# Altium PCB Single_ETU_b_rev1.PcbDoc (part 1 of 6)
Units mil, origin at the board's own origin, x right, y up, seen from the top; angles counter-clockwise.
Board outline 5341 x 2710 mil, 10 copper layers (Top Layer, GND1, Signal 1, GND2, VDDA, VDD, GND3, Signal 2, GND4, Bottom Layer), stack 59.76 mil thick; 283 components, 478 nets, 1863 pads, 875 vias.
Unrouted connection lines stored in the file: 3.
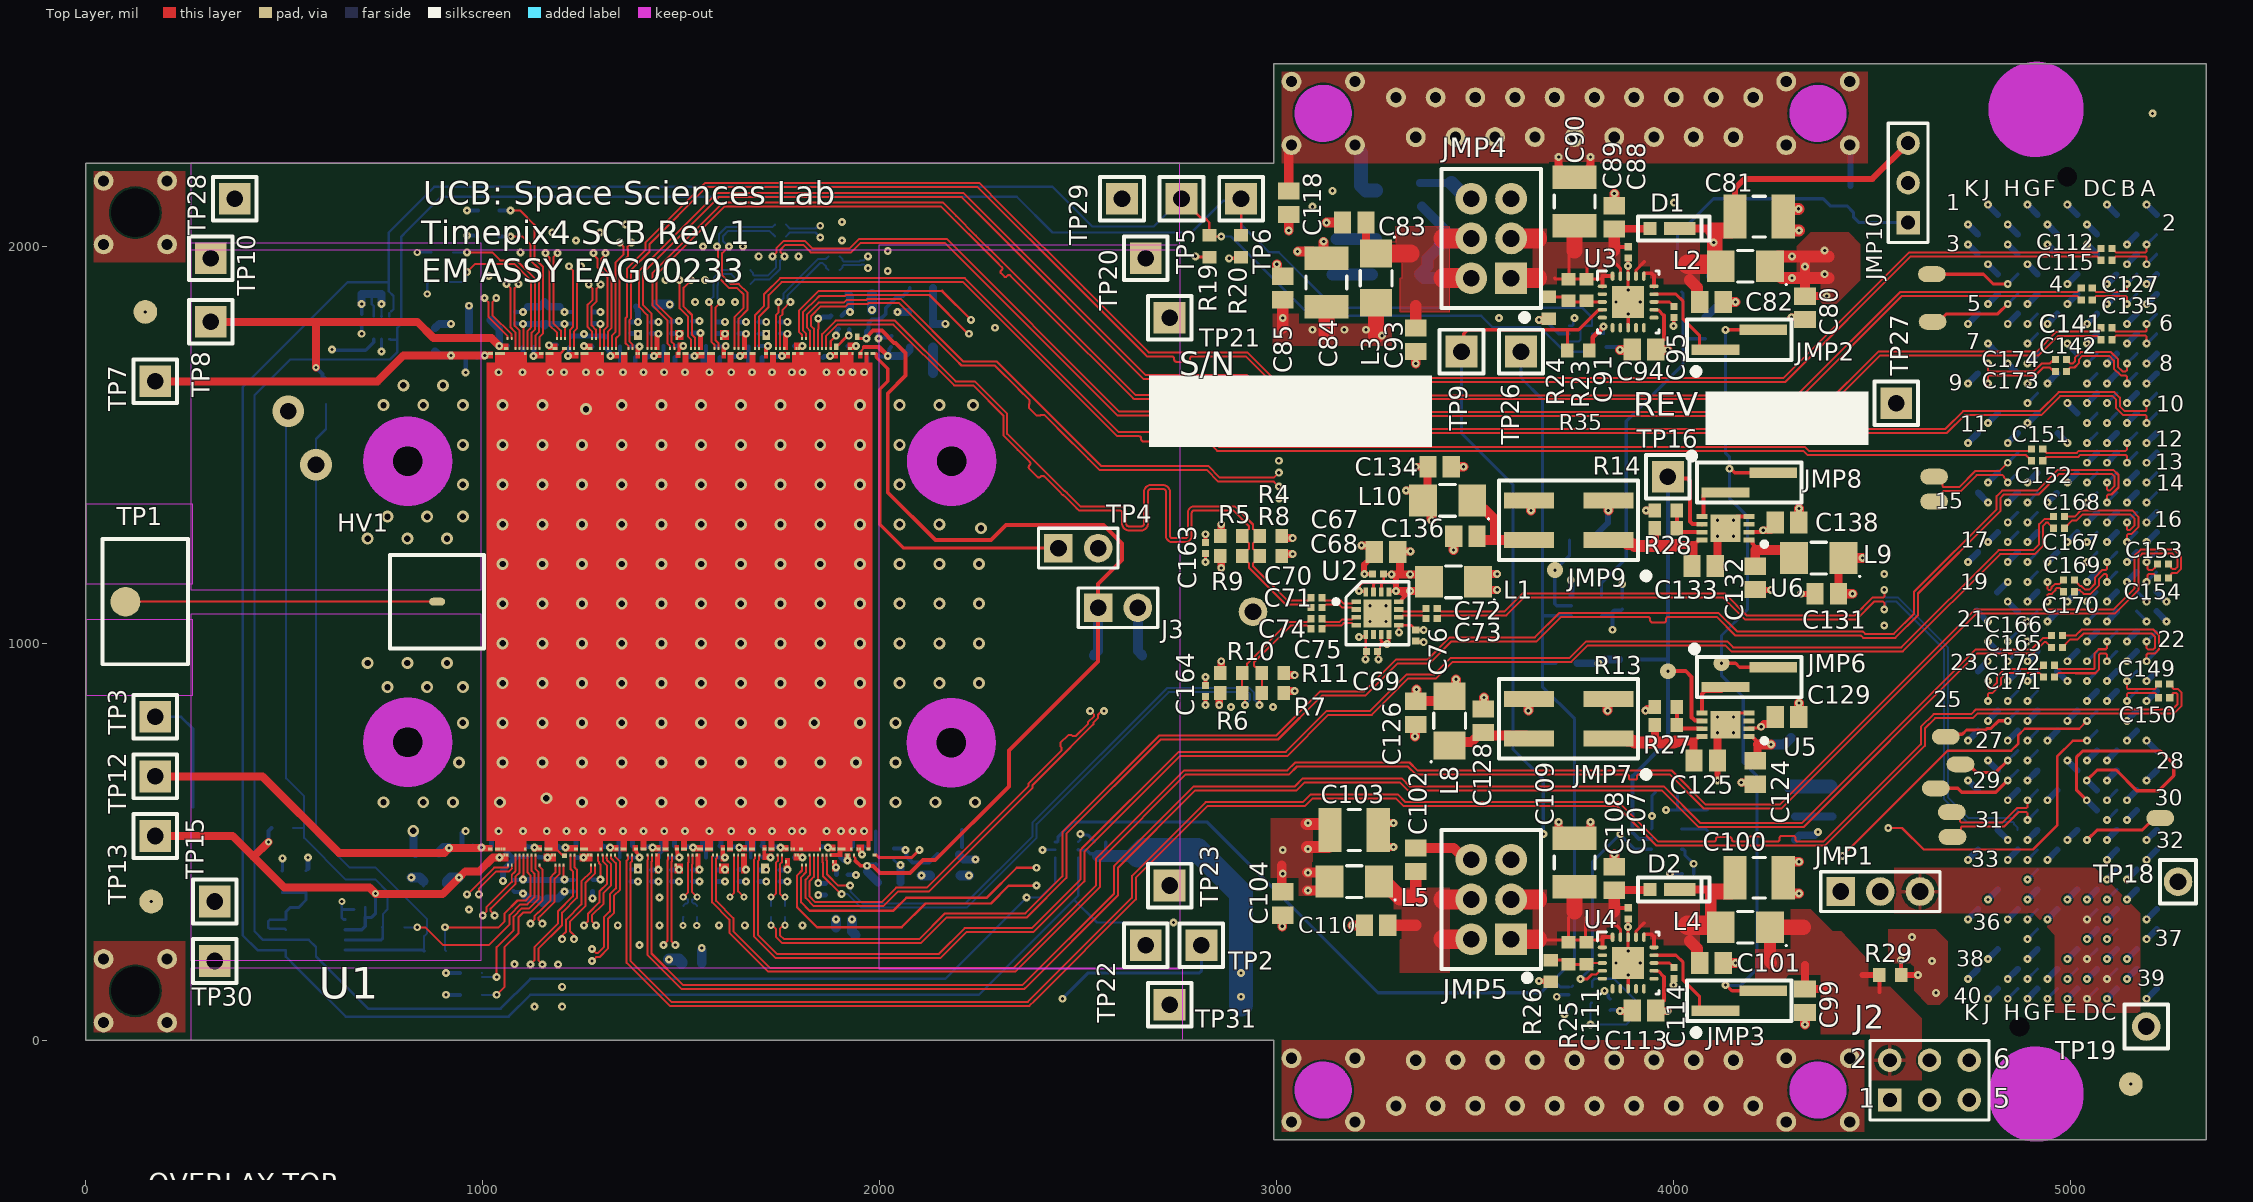
[diagram p0: Top Layer view]
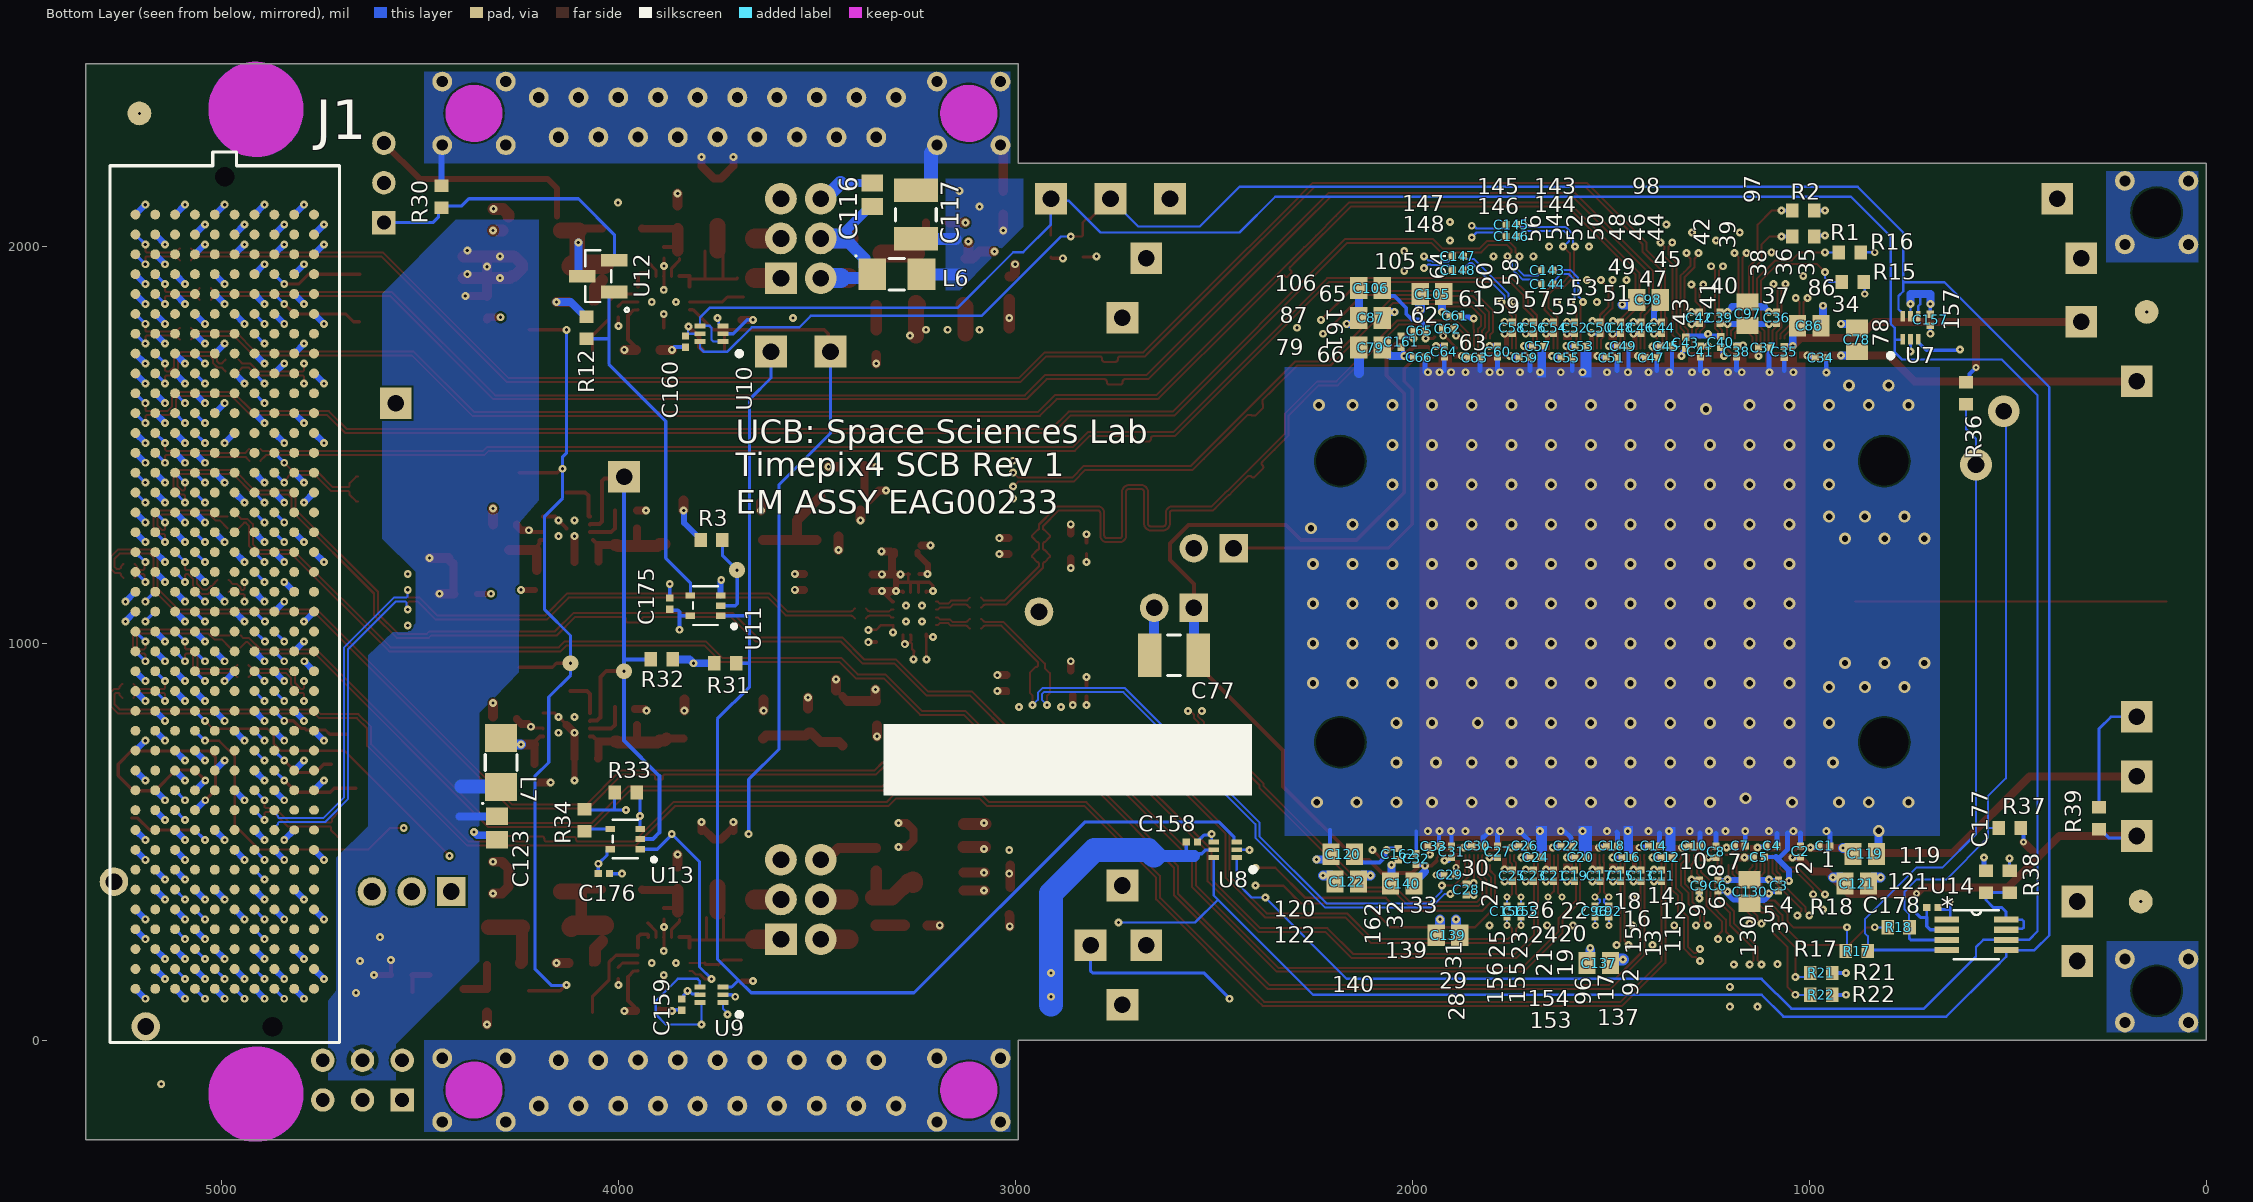
[diagram p1: Bottom Layer view, seen from below]
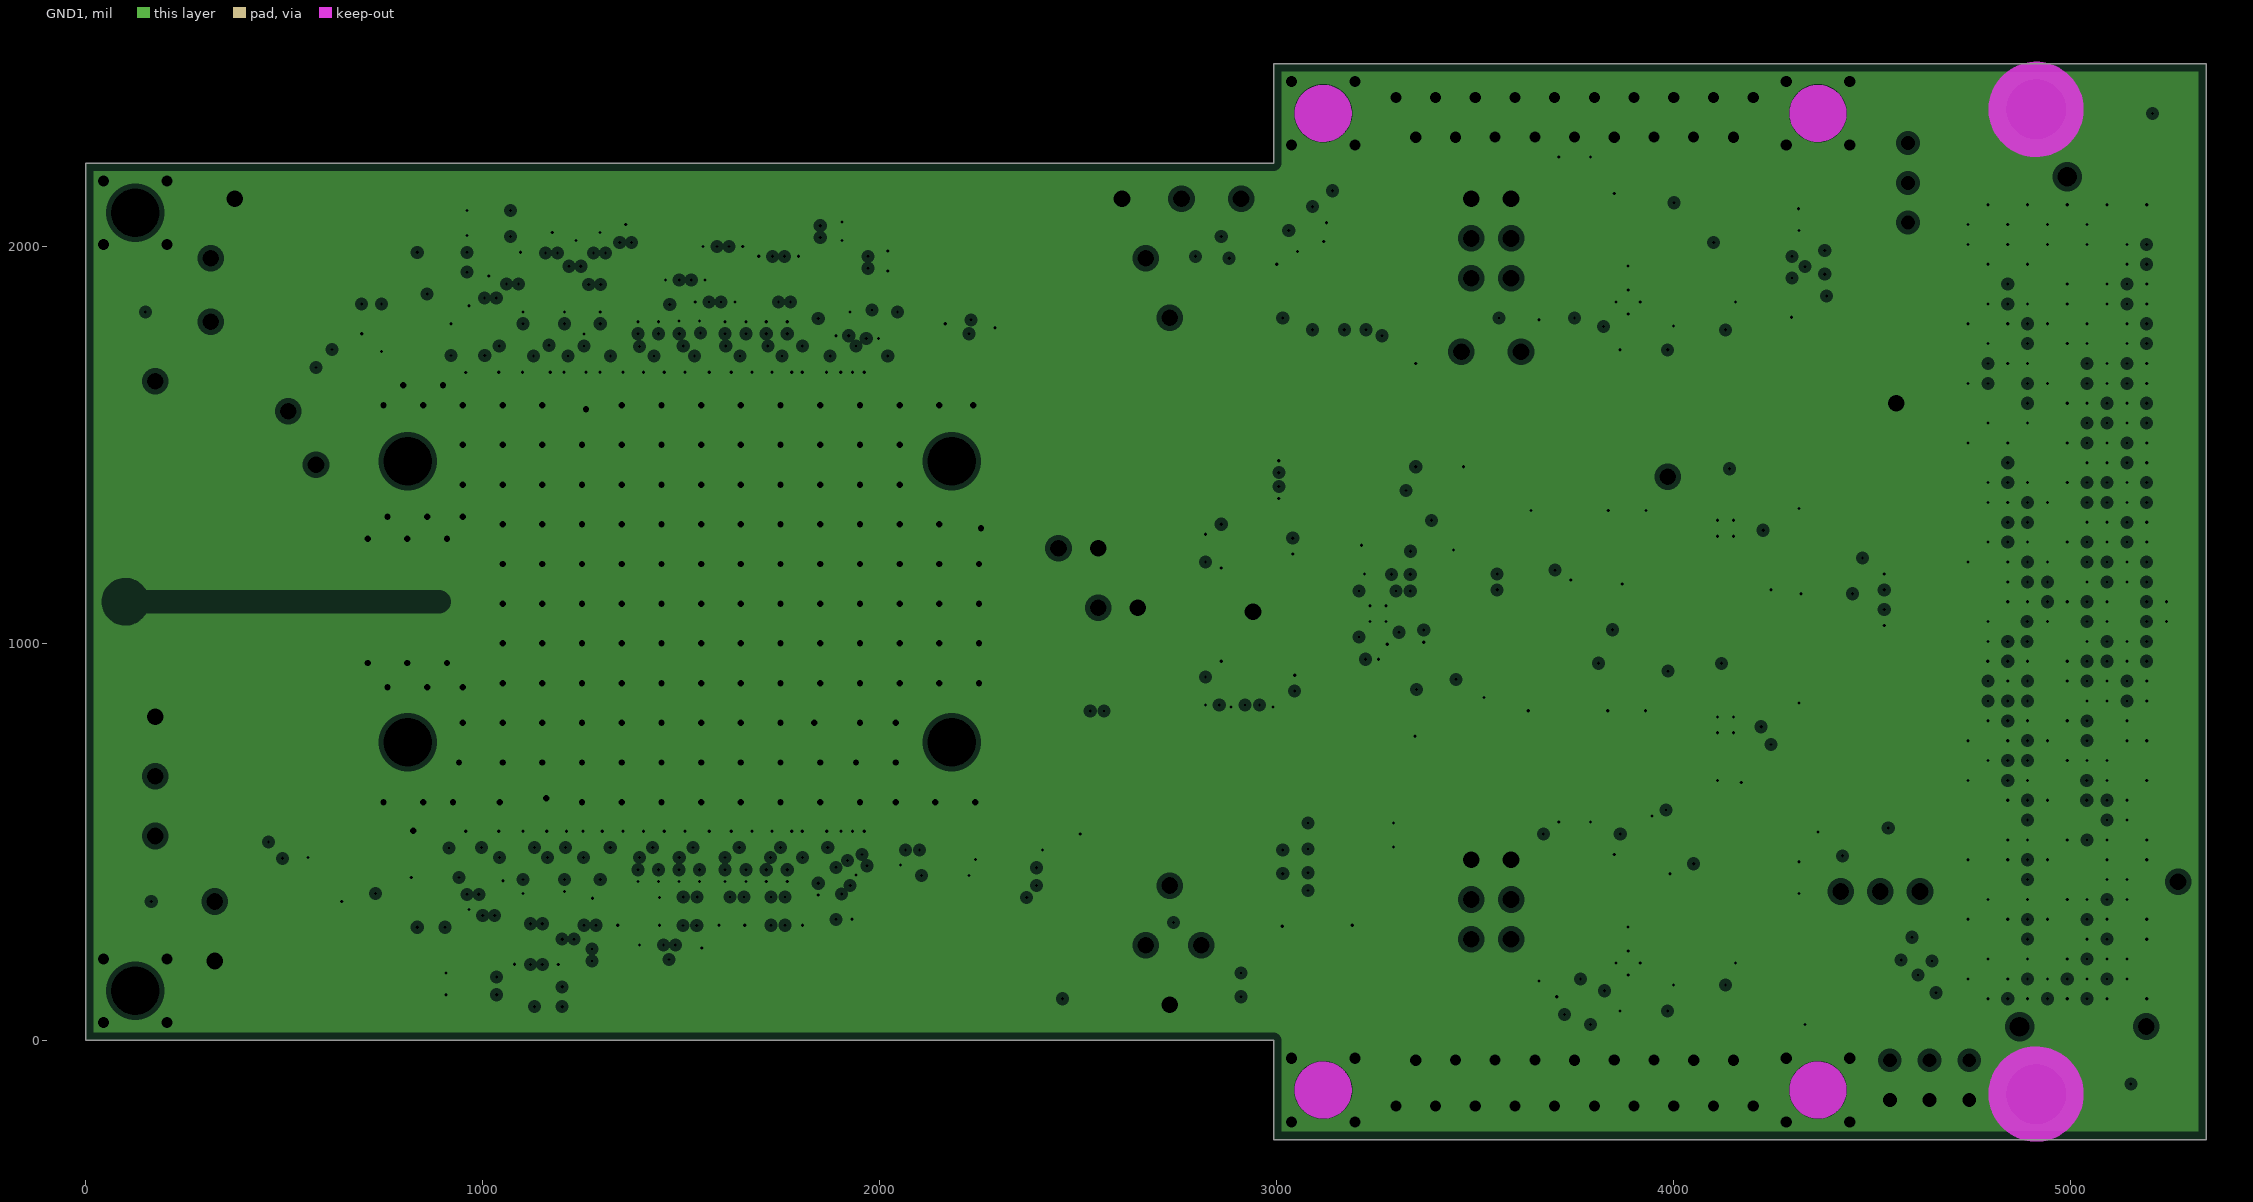
[diagram p2: GND1, clearances drawn from the general rule]
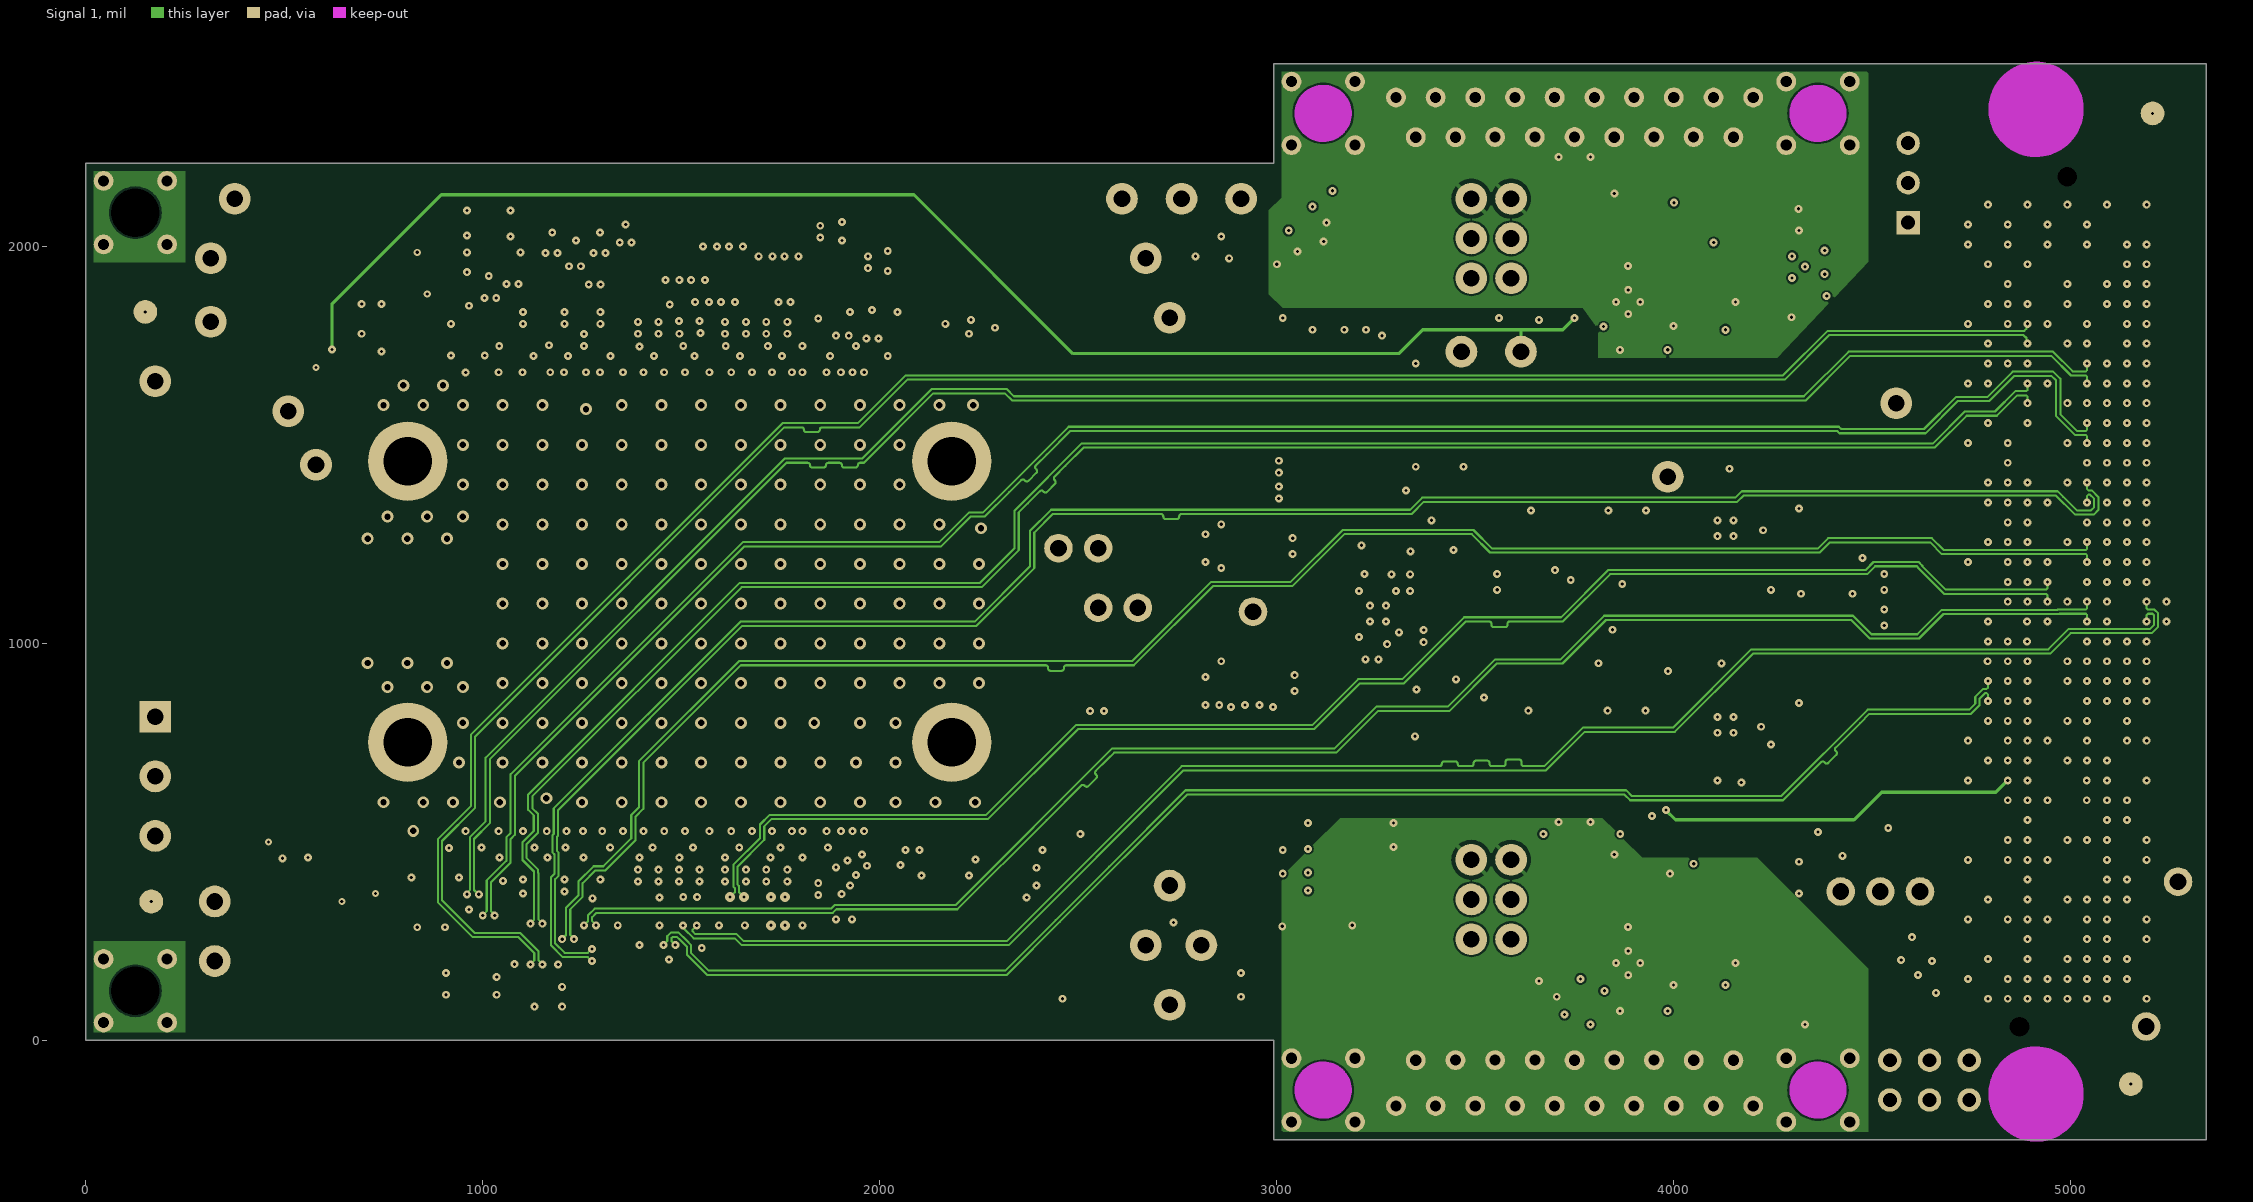
[diagram p3: Signal 1]
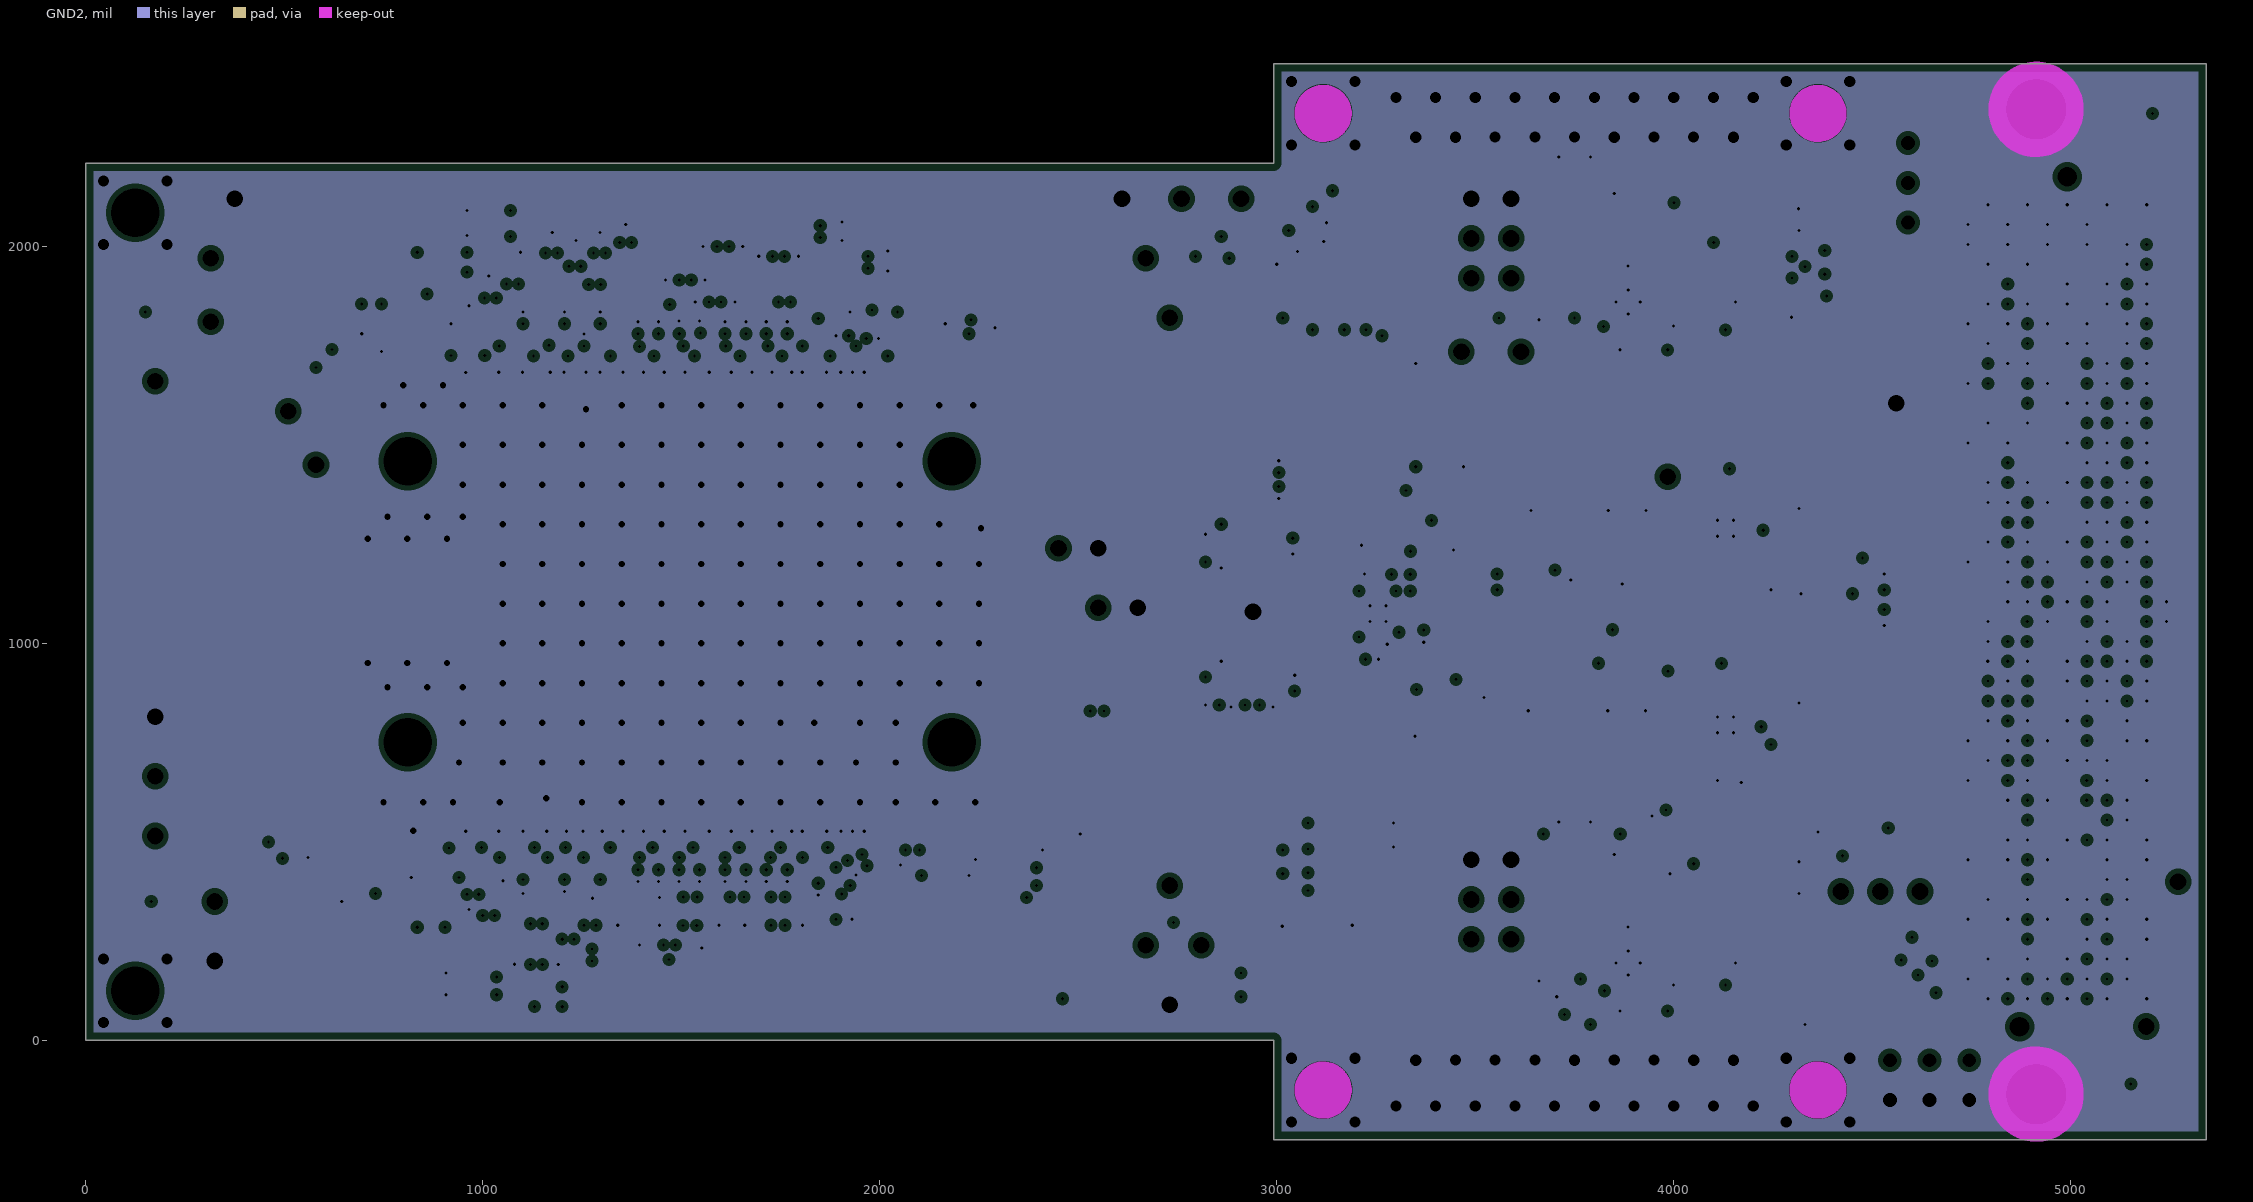
[diagram p4: GND2, clearances drawn from the general rule]
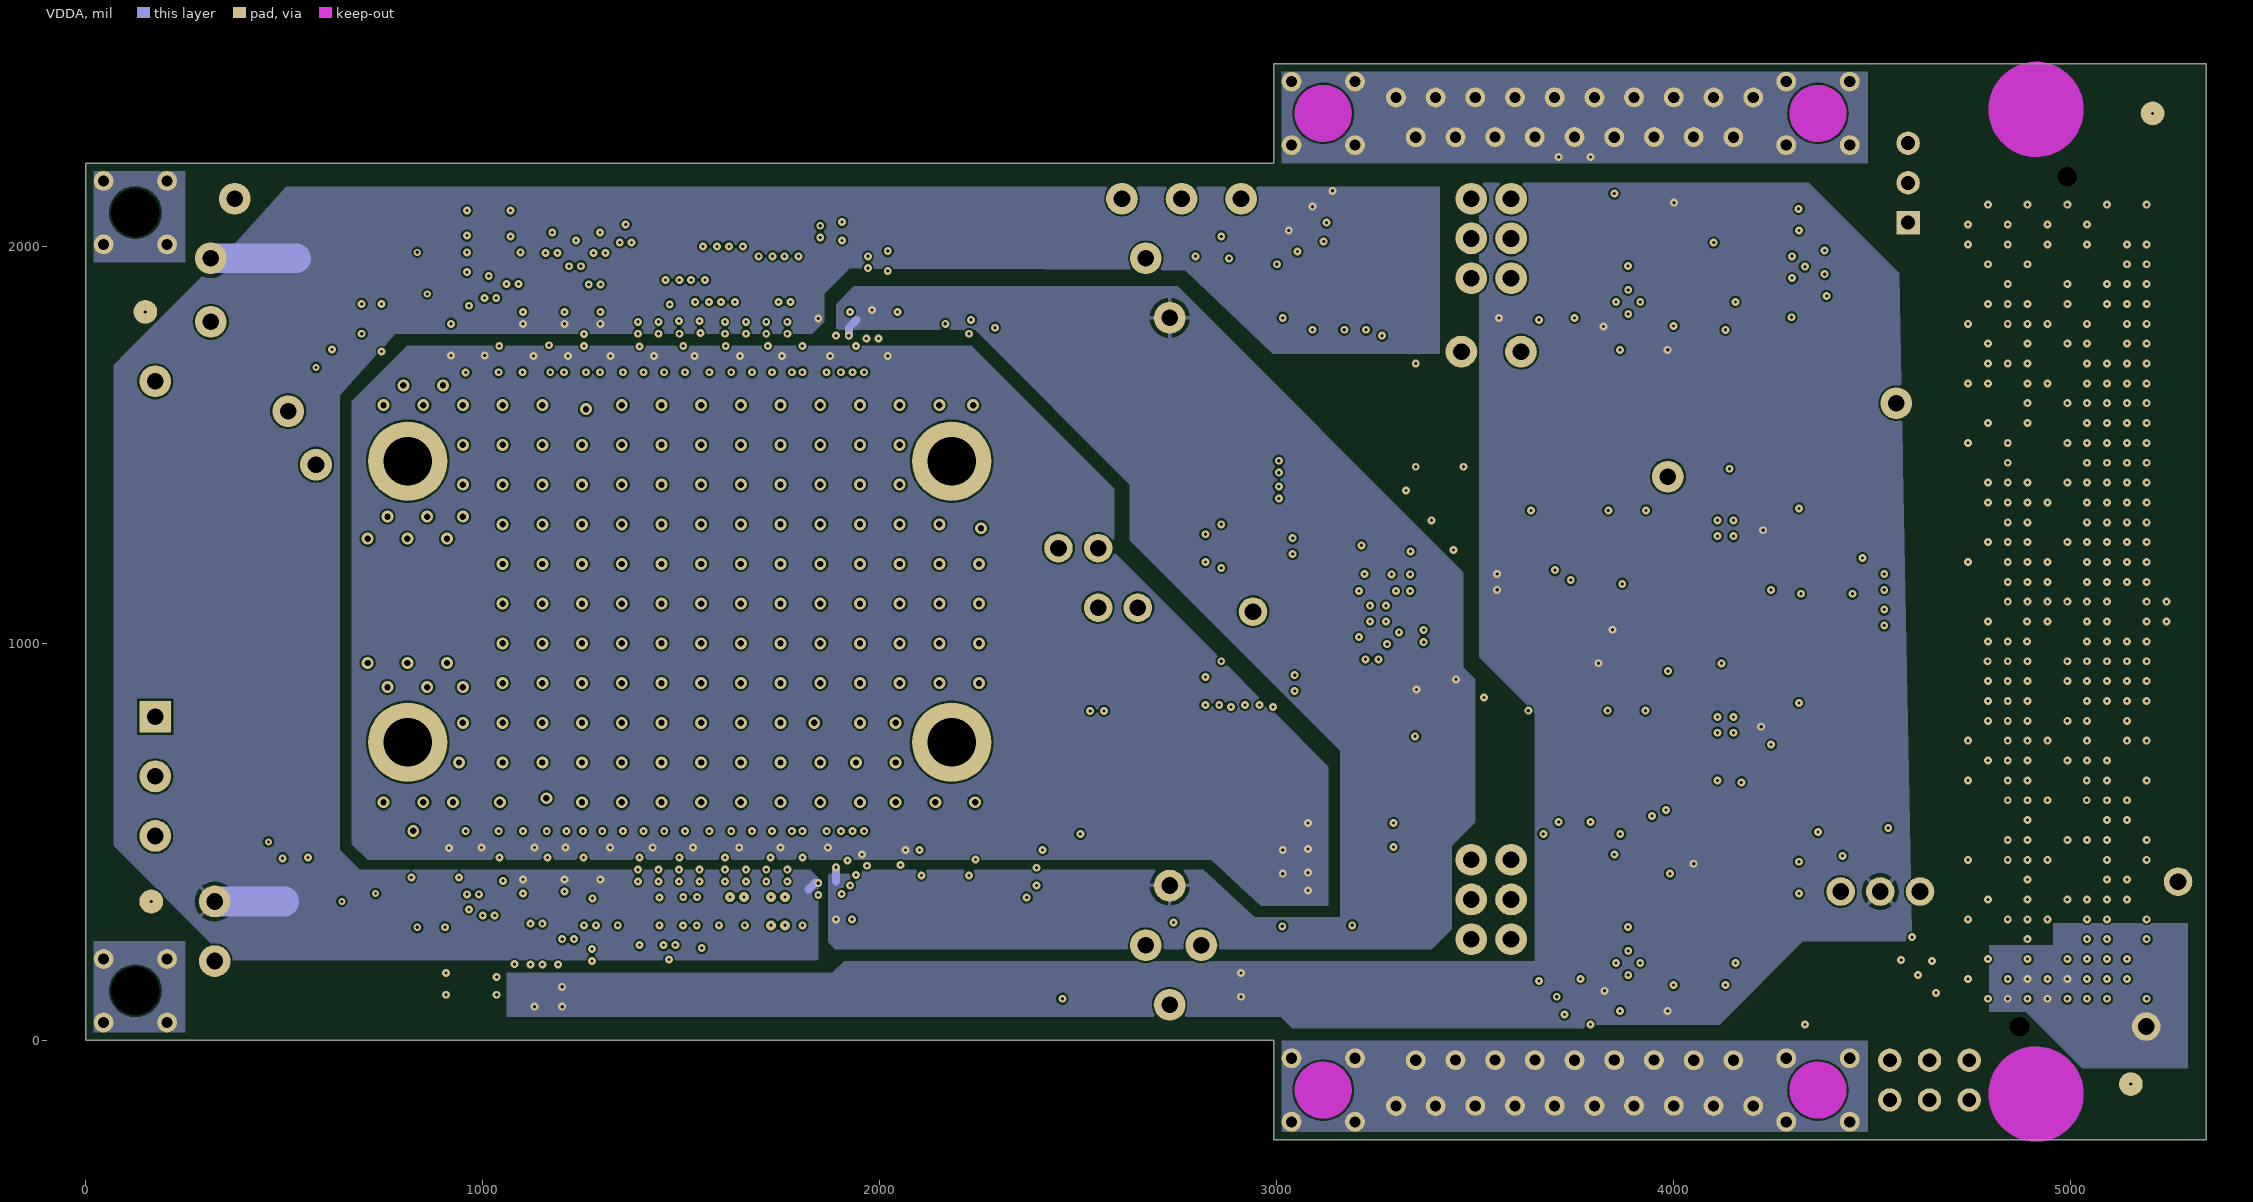
[diagram p5: VDDA]
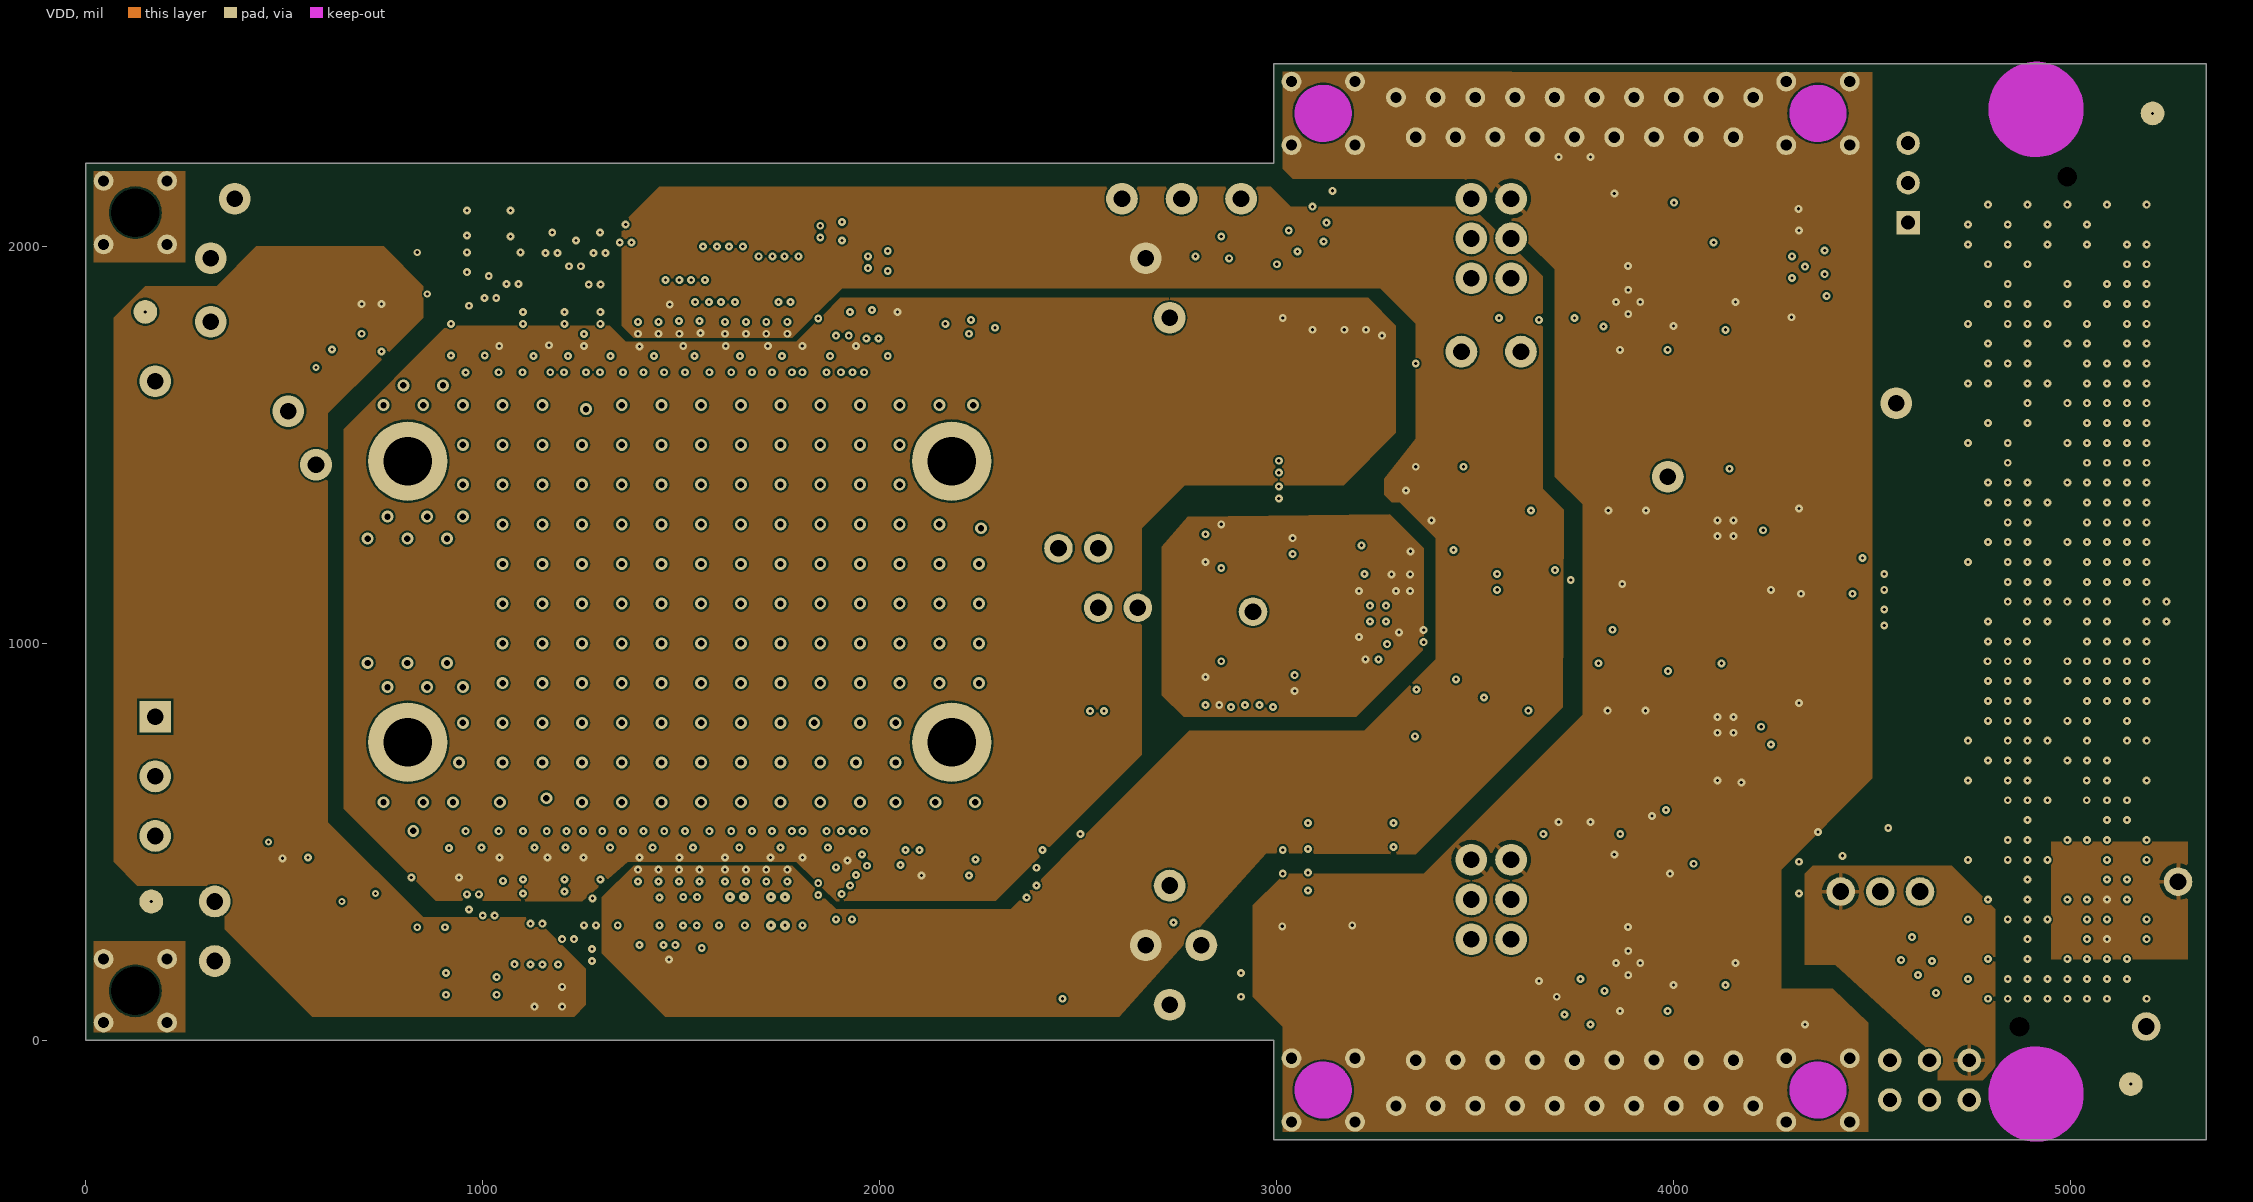
[diagram p6: VDD]
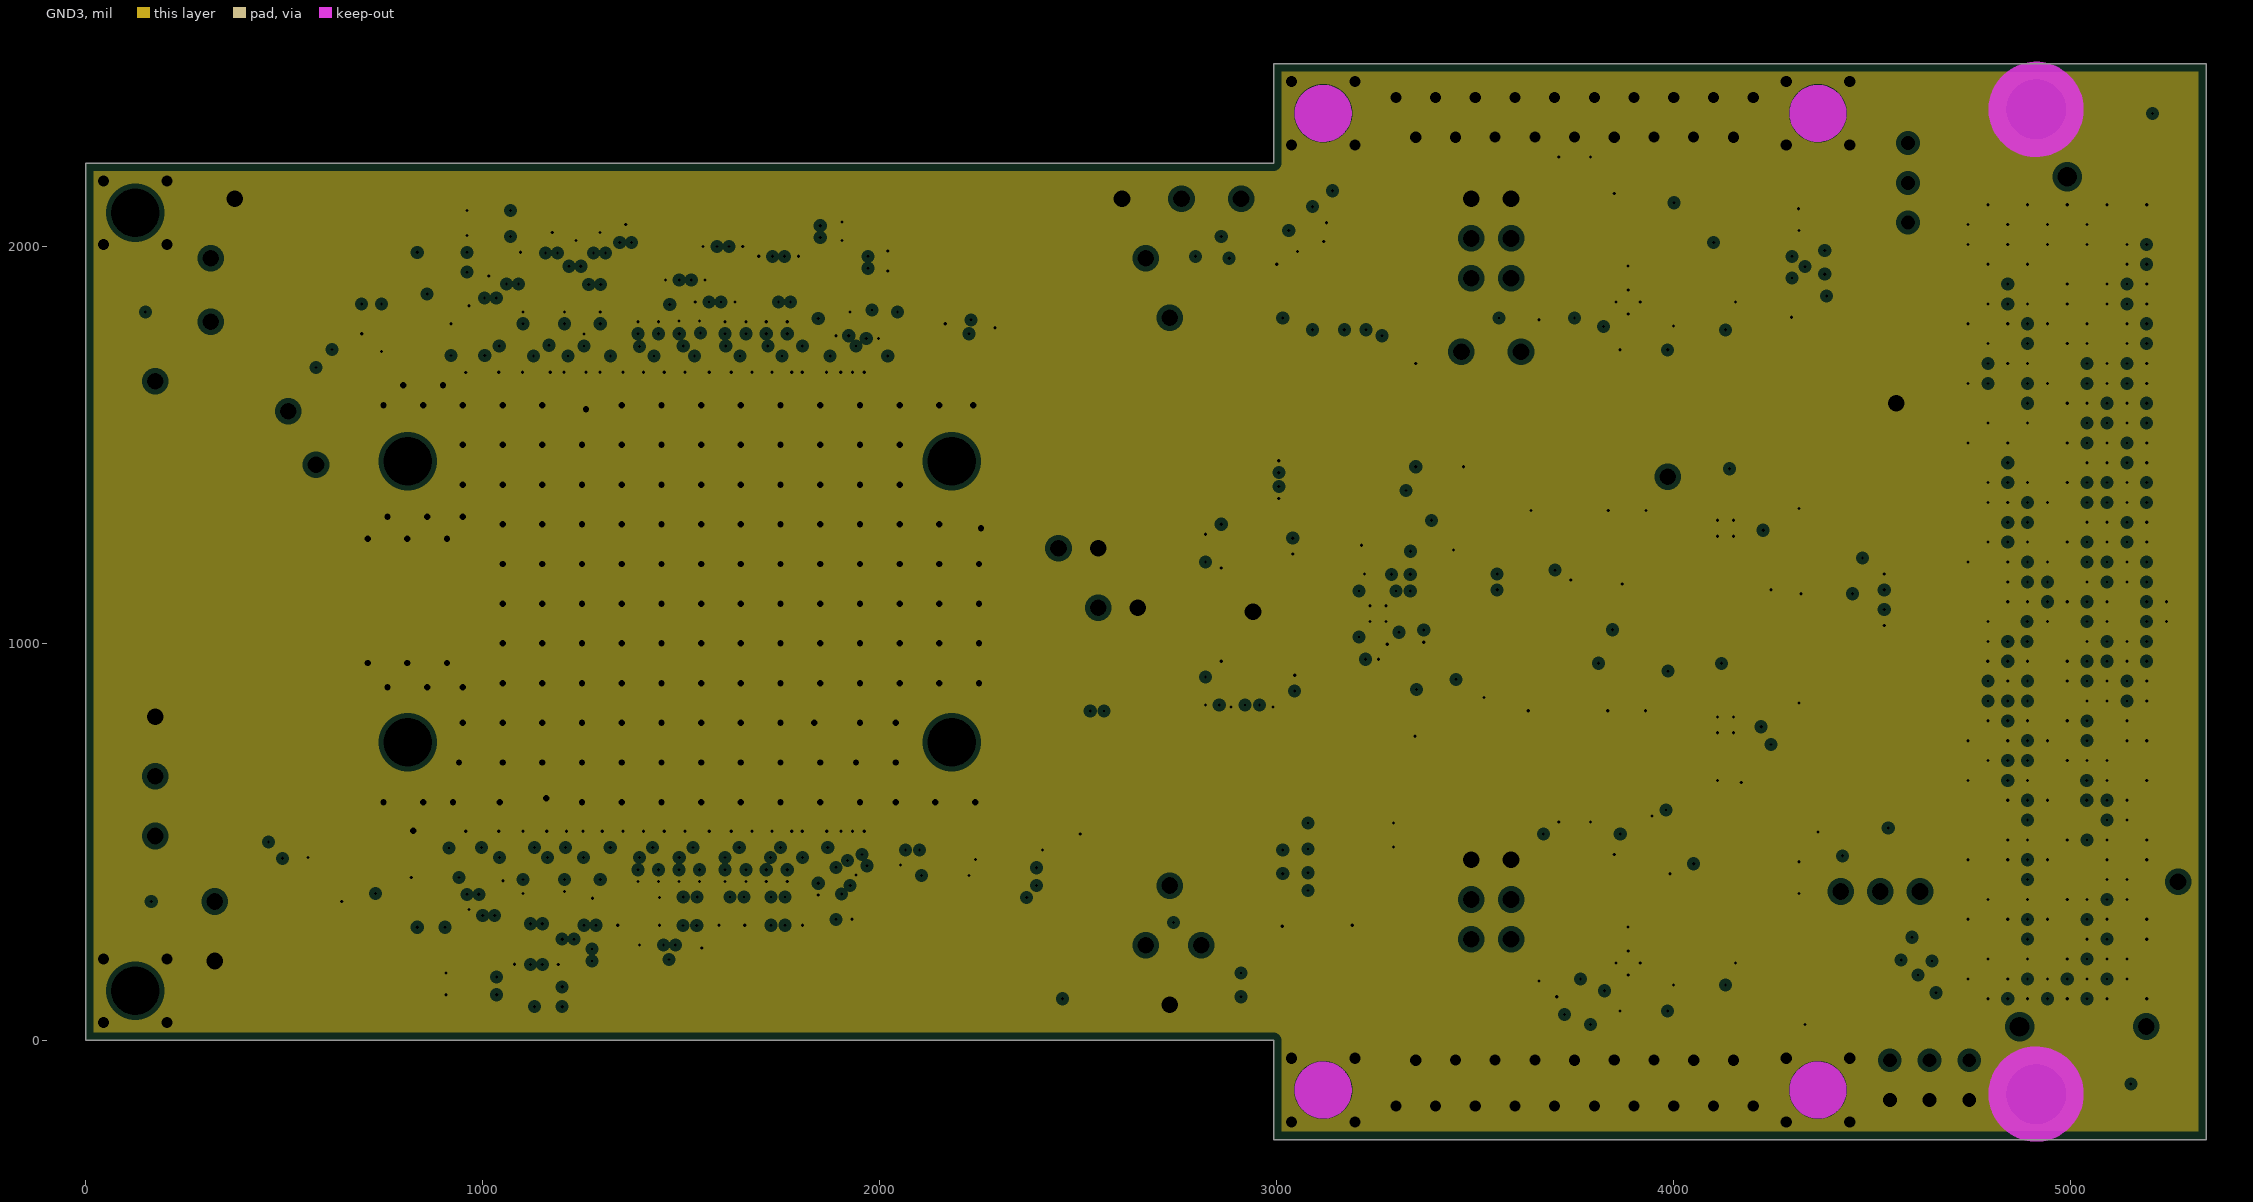
[diagram p7: GND3, clearances drawn from the general rule]
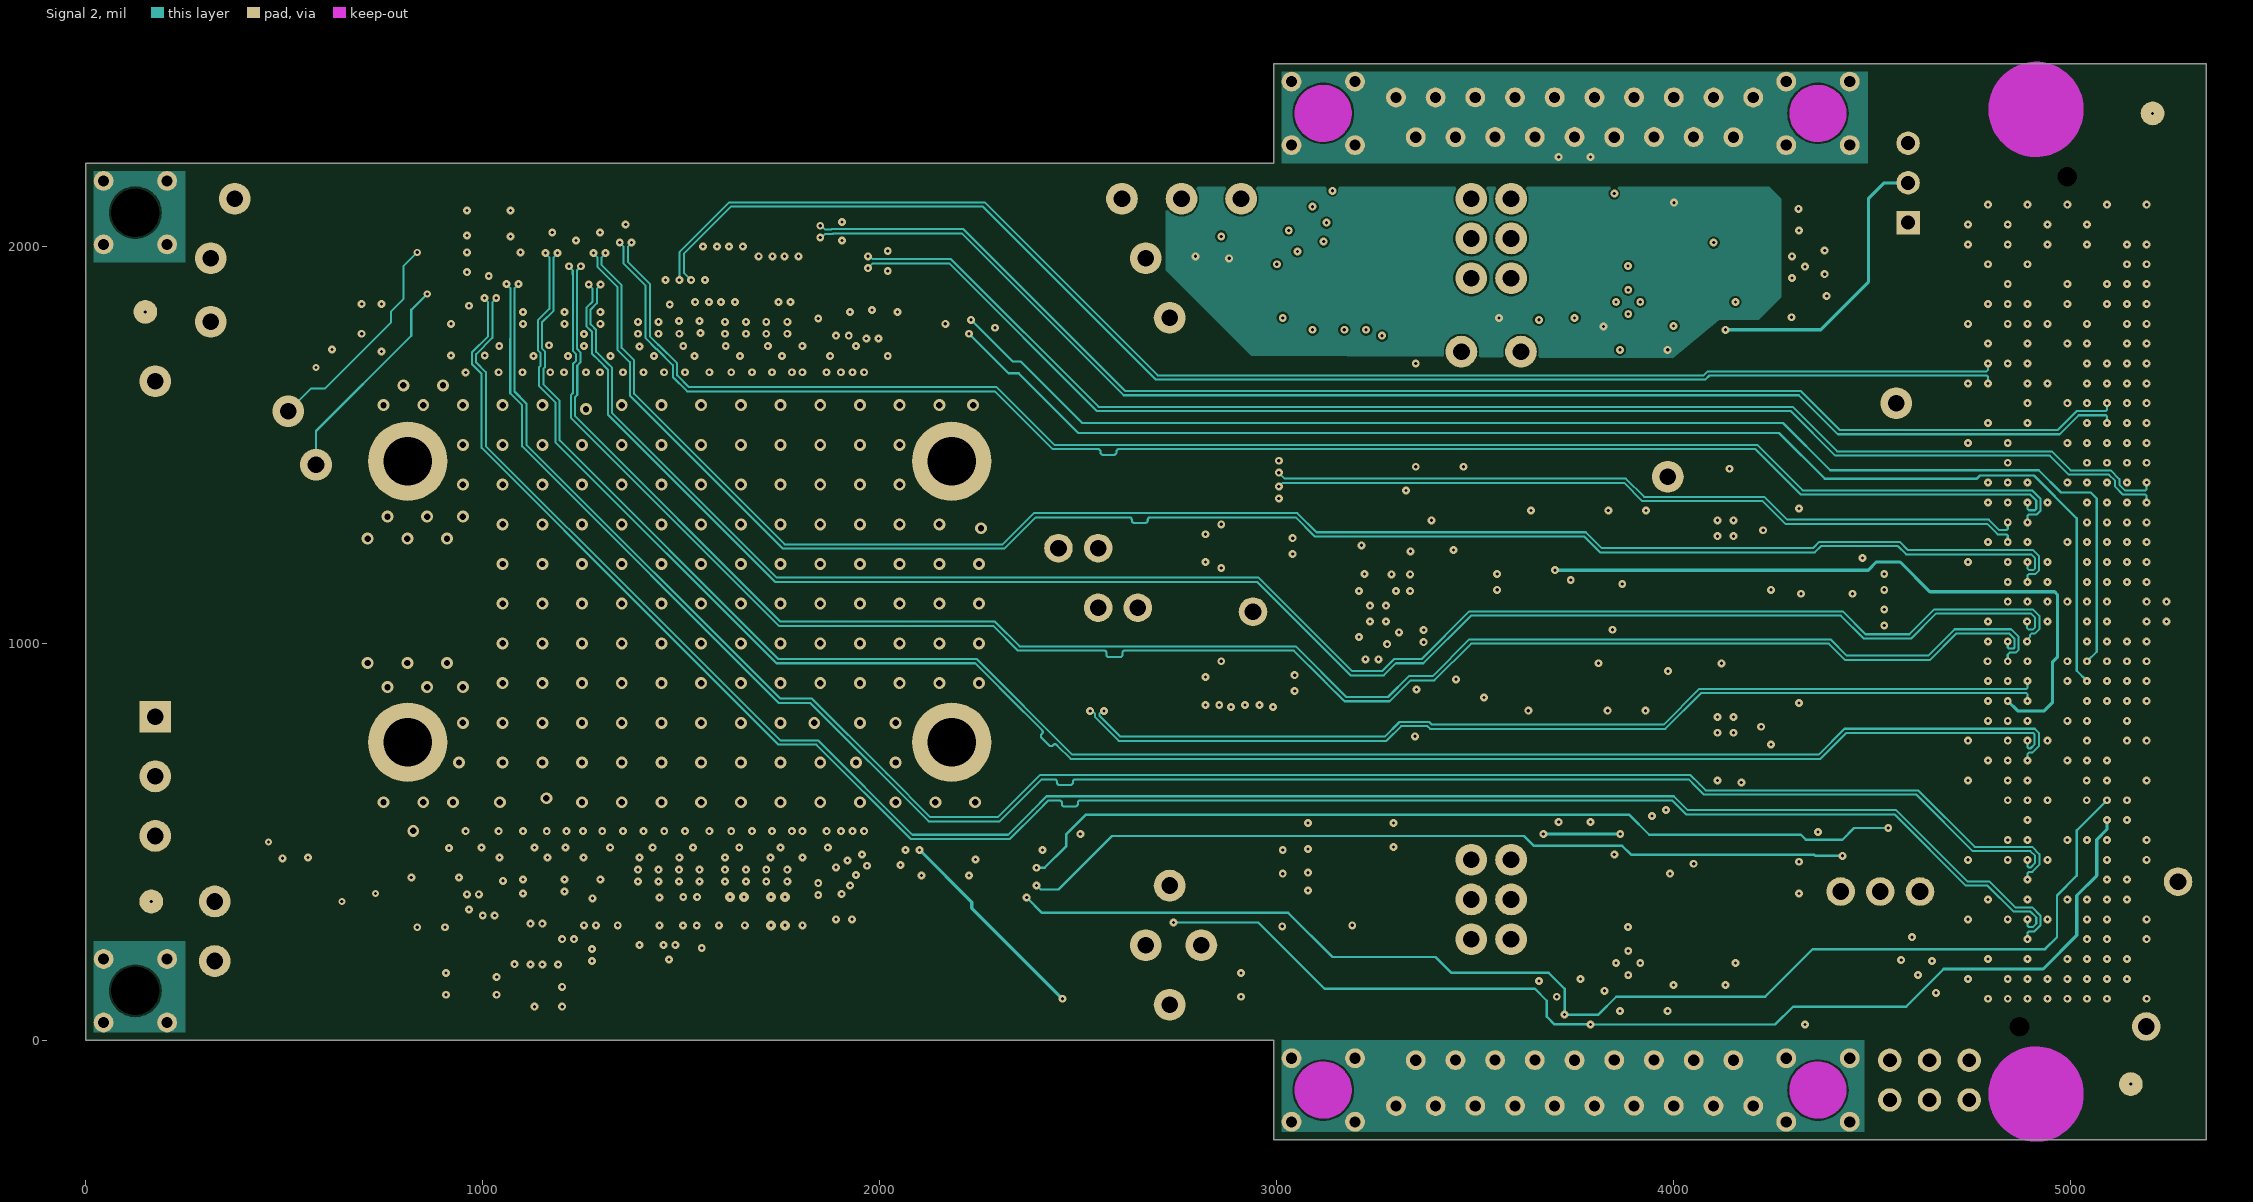
[diagram p8: Signal 2]
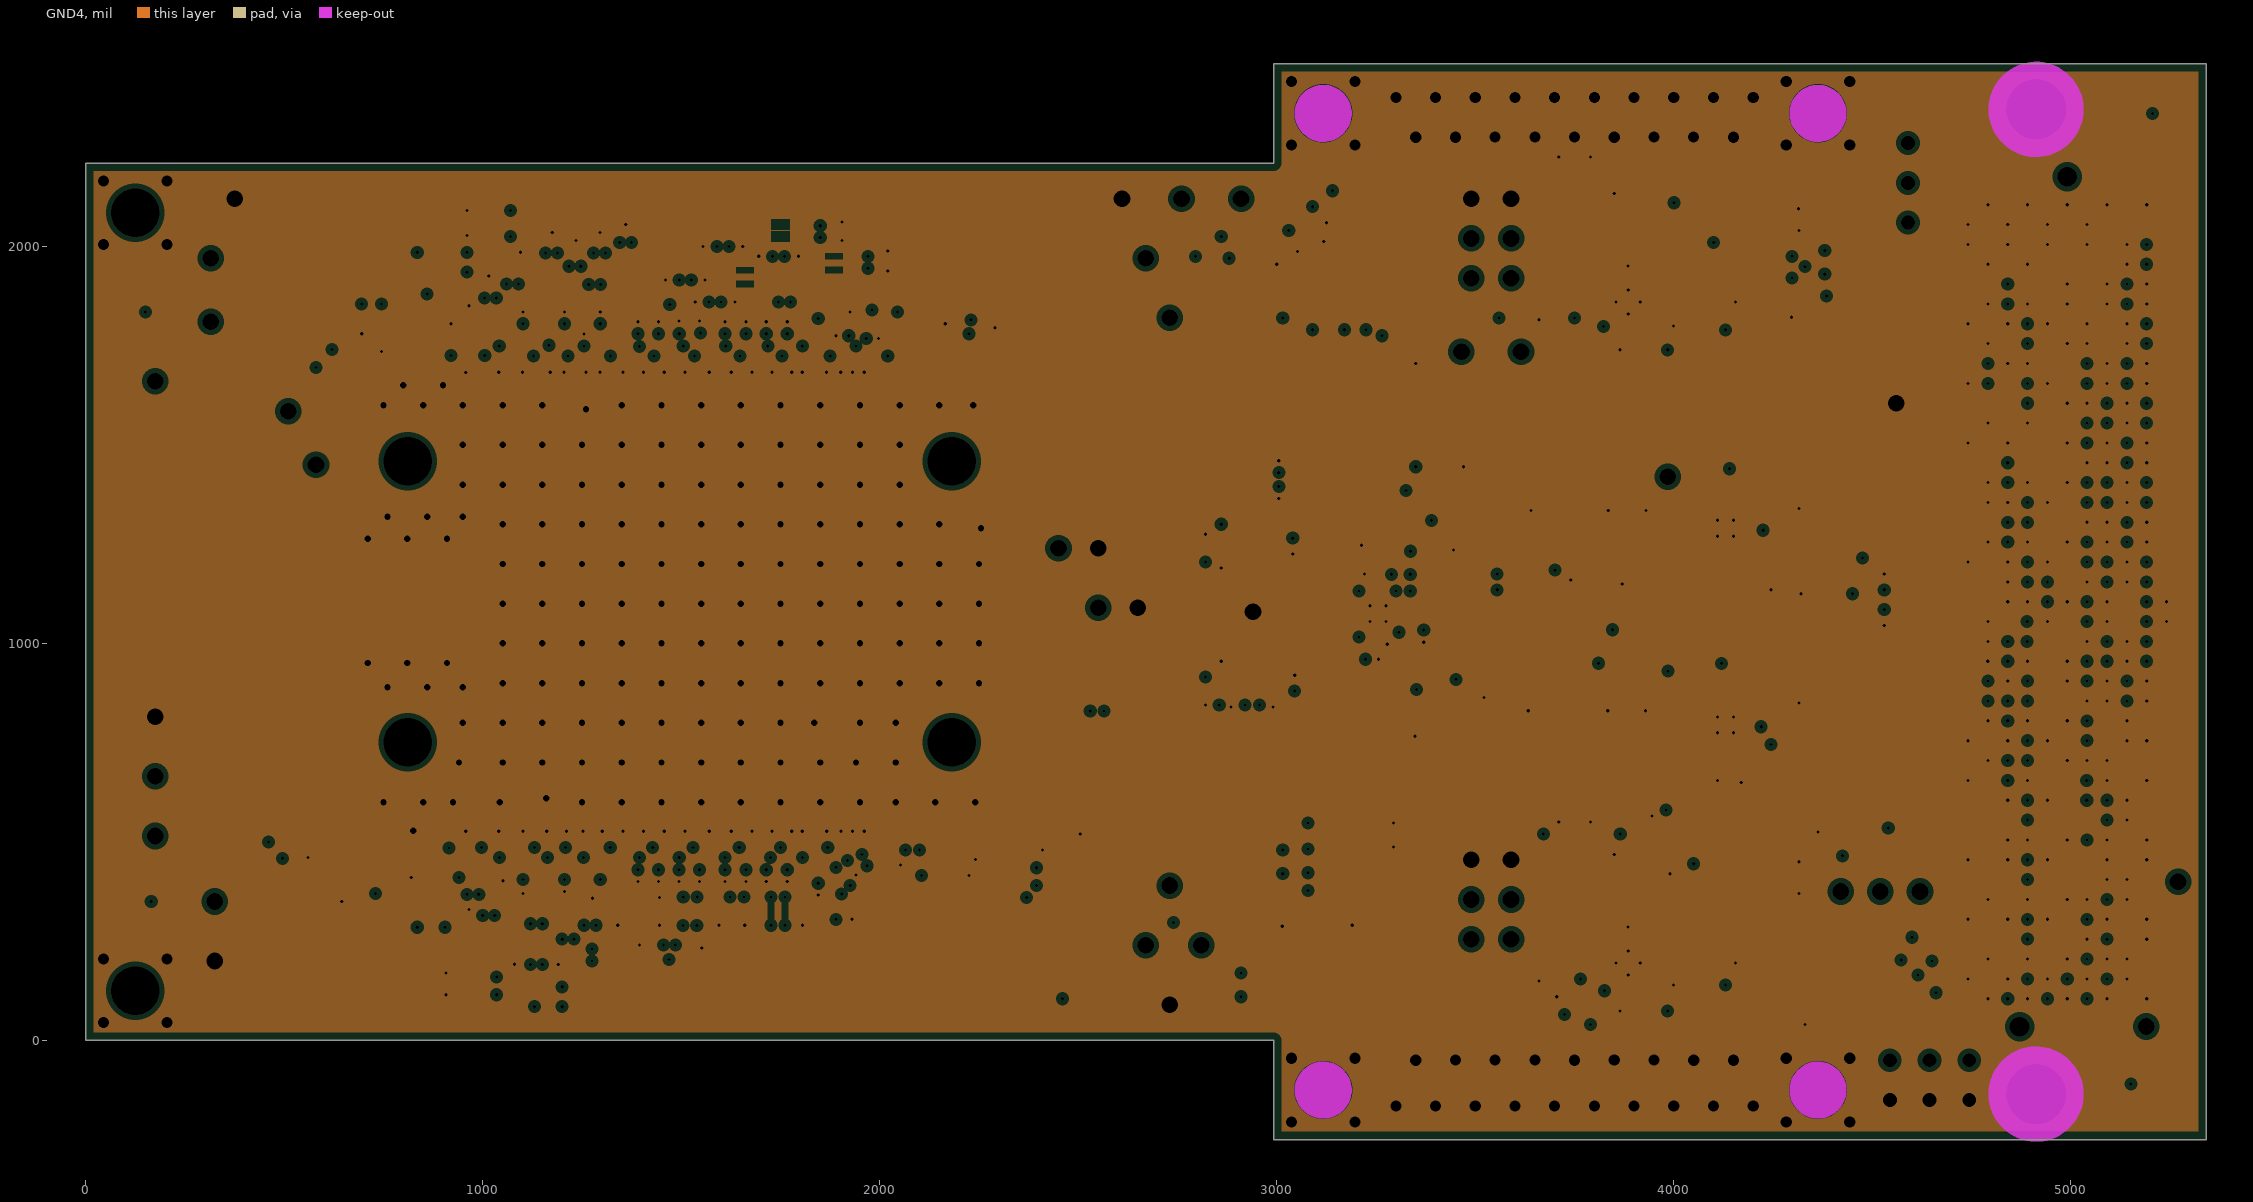
[diagram p9: GND4, clearances drawn from the general rule]

## Layer stack, top to bottom
Top Solder: solder mask 0.5, Solder Resist, Dk 4.2
Top Layer: signal copper 0.689
Dielectric 1: core 4.416, FR-4, Dk 3.41
GND1: plane copper 1.378, net GND
Dielectric 2: prepreg 7, Dk 3.89
Signal 1: signal copper 0.689
Dielectric 3: prepreg 5.152, PP-006, Dk 3.505
GND2: plane copper 1.378, net GND
Dielectric 4: prepreg 4.2, PP-006, Dk 3.52
VDDA: signal copper 1.378
Dielectric 5: prepreg 7.2, PP-006, Dk 3.6
VDD: signal copper 1.378
Dielectric 7: prepreg 4.2, PP-006, Dk 3.52
GND3: plane copper 1.378, net GND
Dielectric 6: prepreg 5.152, PP-006, Dk 3.505
Signal 2: signal copper 0.689
Dielectric 8: prepreg 7, PP-006, Dk 3.89
GND4: plane copper 1.378, net GND
Dielectric 9: prepreg 4.416, PP-006, Dk 3.41
Bottom Layer: signal copper 0.689
Bottom Solder: solder mask 0.5, Solder Resist, Dk 4.2

## Board outline
0,0 2992,0 2992,-250 5341,-250 5341,2460 2992,2460 2992,2210 0,2210

## Design rules (kind name [scope] priority, off if disabled: settings)
BoardOutlineClearance [All] p1: gap=0 ignorepadtopadclearanceinfootprint=FALSE except(10: Arc-OutlineEdge Arc-CavityEdge Arc-CutoutEdge Arc-SplitBarrior; 20: Track-OutlineEdge Track-CavityEdge Track-CutoutEdge Track-SplitBarrior Track-SplitContinuation SMDPad-OutlineEdge SMDPad-CavityEdge SMDPad-CutoutEdge SMDPad-SplitBarrior SMDPad-SplitContinuation Via-OutlineEdge Via-CavityEdge Via-CutoutEdge Via-SplitBarrior Via-SplitContinuation Poly-OutlineEdge Poly-CavityEdge Poly-CutoutEdge Poly-SplitBarrior Poly-SplitContinuation)
Clearance "Clearance_Diff Pairs_to_Diff Pairs" [(InDifferentialPairClass('All Differential Pairs')) And (InDifferentialPairClass('All Differential Pairs'))] p1: gap=5 ignorepadtopadclearanceinfootprint=FALSE except(4.95: Arc-Arc Arc-Track Arc-SMDPad Track-Track Track-SMDPad SMDPad-SMDPad)
Clearance Clearance_polygons_counter_sunk [InPolygon and (PAD_JumperID=7)] p2: gap=45 ignorepadtopadclearanceinfootprint=FALSE
Clearance Clearance_1 [All] p3: gap=5 ignorepadtopadclearanceinfootprint=FALSE except(4.95: Arc-Arc Arc-Track Arc-SMDPad Track-Track Track-SMDPad; 10: Via-Via)
Clearance "Clearance_Diff Pairs to Polygons" [(InDifferentialPairClass('All Differential Pairs')) And IsPad vs IsSplitPlane Or IsRegion] p4: gap=5 ignorepadtopadclearanceinfootprint=FALSE
Clearance "Clearance_Diff Pairs" [(InDifferentialPairClass('All Differential Pairs')) And IsTrack] p5: gap=5 ignorepadtopadclearanceinfootprint=FALSE
Clearance "Clearance_Diff Pairs to All" [(InDifferentialPairClass('All Differential Pairs')) And IsTrack Or IsRegion vs IsTrack Or IsRegion] p6: gap=5 ignorepadtopadclearanceinfootprint=FALSE
Clearance Clearance_polygons_generic [InPolygon] p7: gap=10 ignorepadtopadclearanceinfootprint=FALSE except(0: Arc-Hole Track-Hole SMDPad-Hole THPad-Hole Via-Hole Fill-Hole Poly-Hole Region-Hole Text-Hole)
ComponentClearance [All] p1 off: gap=5 collisioncheckmode=3 verticalgap=10 showdistances=FALSE
DiffPairsRouting DiffPairsRouting_microstrip_top [OnLayer('Top Layer') And InDifferentialPairClass('All Differential Pairs')] p1: maxlimit=10 minlimit=5 mostfreqgap=10 toplayer_maxgap=5 toplayer_prefgap=5 toplayer_minwidth=5.04 toplayer_maxwidth=5.04 toplayer_prefwidth=5.04 bottomlayer_maxgap=5 bottomlayer_prefgap=5 bottomlayer_minwidth=5.04 bottomlayer_maxwidth=5.04 bottomlayer_prefwidth=7.41 impedanceprofiledriven=TRUE impedanceprofileid={2D9F1552-B89F-41BC-B3A4-6CAAB3E156A8} impedanceprofilevalue=93.000000 maxuncoupledlength=200
DiffPairsRouting DiffPairsRouting_symmetric_stripline_2 [OnLayer('Signal 1') And InDifferentialPairClass('All Differential Pairs')] p2: maxlimit=10 minlimit=5 mostfreqgap=10 midlayer2_mingap=5.5 midlayer2_maxgap=5.5 midlayer2_prefgap=5.5 midlayer2_minwidth=5.16 midlayer2_maxwidth=5.16 midlayer2_prefwidth=5.16 midlayer6_mingap=5.5 midlayer6_maxgap=5.5 midlayer6_prefgap=5.5 midlayer6_minwidth=5.16 midlayer6_maxwidth=5.16 midlayer6_prefwidth=5.06 impedanceprofiledriven=TRUE impedanceprofileid={EF68F3C5-33E1-4FB1-8024-BC4C6F92DD95} impedanceprofilevalue=93.000000 maxuncoupledlength=200
DiffPairsRouting DiffPairsRouting_asymmetric_strip_VDD [OnLayer('VDD') And InDifferentialPairClass('All Differential Pairs')] p3: maxlimit=10.08 minlimit=5 mostfreqgap=10.08 midlayer3_mingap=9 midlayer3_prefgap=6.54 midlayer3_minwidth=4 midlayer3_maxwidth=4.5 midlayer3_prefwidth=4.5 midlayer4_mingap=9 midlayer4_prefgap=6.47 midlayer4_minwidth=4 midlayer4_maxwidth=4.5 midlayer4_prefwidth=4.5 impedanceprofiledriven=TRUE impedanceprofileid={2B48FCEE-BDC5-473A-A049-B00612534D09} impedanceprofilevalue=93.000000 maxuncoupledlength=200
DiffPairsRouting DiffPairsRouting_asymmetric_strip_VDDA_1 [OnLayer('VDDA') And InDifferentialPairClass('All Differential Pairs')] p4: maxlimit=10.08 minlimit=5 mostfreqgap=10.08 midlayer3_mingap=9 midlayer3_prefgap=6.54 midlayer3_minwidth=4 midlayer3_maxwidth=4.5 midlayer3_prefwidth=4.5 midlayer4_mingap=9 midlayer4_prefgap=6.47 midlayer4_minwidth=4 midlayer4_maxwidth=4.5 midlayer4_prefwidth=4.5 impedanceprofiledriven=TRUE impedanceprofileid={2B48FCEE-BDC5-473A-A049-B00612534D09} impedanceprofilevalue=93.000000 maxuncoupledlength=200
DiffPairsRouting DiffPairsRouting_symmetric_stripline_7 [OnLayer('Signal 2') And InDifferentialPairClass('All Differential Pairs')] p5: maxlimit=10 minlimit=5 mostfreqgap=10 midlayer2_mingap=5.5 midlayer2_maxgap=5.5 midlayer2_prefgap=5.5 midlayer2_minwidth=5.16 midlayer2_maxwidth=5.16 midlayer2_prefwidth=5.16 midlayer6_mingap=5.5 midlayer6_maxgap=5.5 midlayer6_prefgap=5.5 midlayer6_minwidth=5.16 midlayer6_maxwidth=5.16 midlayer6_prefwidth=5.06 impedanceprofiledriven=TRUE impedanceprofileid={EF68F3C5-33E1-4FB1-8024-BC4C6F92DD95} impedanceprofilevalue=93.000000 maxuncoupledlength=200
DiffPairsRouting DiffPairsRouting_microstrip_bot [OnLayer('Bottom Layer') And InDifferentialPairClass('All Differential Pairs')] p6: maxlimit=10 minlimit=5 mostfreqgap=10 toplayer_maxgap=5 toplayer_prefgap=5 toplayer_minwidth=5.04 toplayer_maxwidth=5.04 toplayer_prefwidth=5.04 bottomlayer_maxgap=5 bottomlayer_prefgap=5 bottomlayer_minwidth=5.04 bottomlayer_maxwidth=5.04 bottomlayer_prefwidth=7.41 impedanceprofiledriven=TRUE impedanceprofileid={2D9F1552-B89F-41BC-B3A4-6CAAB3E156A8} impedanceprofilevalue=93.000000 maxuncoupledlength=200
HoleSize [All] p1: absolutevalues=TRUE maxlimit=167 minlimit=8 maxpercent=80.000 minpercent=20.000
Length [All] p1: maxlimit=6000 minlimit=0
MatchedLengths [InDifferentialPairClass('All Differential Pairs')] p1: tolerance=5 checknetsindiffpair=TRUE checkdiffpairvsdiffpair=FALSE checkxsignals=FALSE checkothers=FALSE
MinimumAnnularRing [All] p1: minimumring=5
MinimumSolderMaskSliver [All] p1: minsoldermaskwidth=2
PasteMaskExpansion PasteMaskExpansion_U1 [InComponent('U1')] p1: expansion=-6
PasteMaskExpansion PasteMaskExpansion_1 [All] p2: expansion=0
PlaneClearance PlaneClearance_122_counter_sunk [IsPad And (AsMils(HoleDiameter) = 122) And (PAD_JumperID = 7)] p1: clearance=45
PlaneClearance PlaneClearance_122_counter_sunk_polygon [IsPolygon And (AsMils(HoleDiameter) = 122) And (PAD_JumperID = 7)] p2: clearance=45
PlaneClearance PlaneClearance_115_counter_sunk_1 [IsPad And (AsMils(HoleDiameter) = 115)] p3: clearance=45
PlaneClearance PlaneClearance_diff_pair [(InDifferentialPairClass('All Differential Pairs'))] p4: clearance=12.5
PlaneClearance [All] p5: clearance=12.5
PlaneConnect PlaneConnect_Vias [IsVia] p1: planeconnectstyle=Direct reliefexpansion=20 reliefentries=4 reliefconductorwidth=10 reliefairgap=10
PlaneConnect PlaneConnect_8mil [IsPad And (AsMils(HoleDiameter) = 8)] p2: planeconnectstyle=Direct reliefexpansion=20 reliefentries=4 reliefconductorwidth=10 reliefairgap=10
PlaneConnect PlaneConnect_skewers [IsPad And (AsMils(HoleDiameter) = 84)] p3: planeconnectstyle=Relief reliefexpansion=20 reliefentries=4 reliefconductorwidth=20 reliefairgap=10
PlaneConnect "PlaneConnect_satellite vias" [(ObjectKind = 'Pad') And (AsMils(PadXSize_AllLayers) = 75) And (AsMils(PadYSize_AllLayers) = 75)] p4: planeconnectstyle=Direct reliefexpansion=20 reliefentries=4 reliefconductorwidth=10 reliefairgap=10
PlaneConnect "PlaneConnect_satellite vias_smaller" [(ObjectKind = 'Pad') And (AsMils(PadXSize_AllLayers) = 50) And (AsMils(PadYSize_AllLayers) = 50)] p5: planeconnectstyle=Direct reliefexpansion=20 reliefentries=4 reliefconductorwidth=10 reliefairgap=10
PlaneConnect PlaneConnect_25hole [InNetClass('PwrGnd') And (AsMils(HoleDiameter) = 25)] p6: planeconnectstyle=Relief reliefexpansion=8 reliefentries=4 reliefconductorwidth=6 reliefairgap=8
PlaneConnect PlaneConnect_35hole [InNetClass('PwrGnd') And (AsMils(HoleDiameter) = 35)] p7: planeconnectstyle=Relief reliefexpansion=10 reliefentries=2 reliefconductorwidth=6 reliefairgap=10
PlaneConnect PlaneConnect_42hole [InNetClass('PwrGnd') And (AsMils(HoleDiameter) = 42)] p8: planeconnectstyle=Relief reliefexpansion=10 reliefentries=2 reliefconductorwidth=6 reliefairgap=10
PlaneConnect [InNetClass('PwrGnd')] p9: planeconnectstyle=Relief reliefexpansion=8 reliefentries=4 reliefconductorwidth=8 reliefairgap=8
PolygonConnect PolygonConnect_Vias [IsVia] p1: connectstyle=Direct reliefconductorwidth=10 reliefentries=4 polygonreliefangle="90 Angle" airgapwidth=10
PolygonConnect PolygonConnect_8mil [IsPad And (AsMils(HoleDiameter) = 8)] p2: connectstyle=Direct reliefconductorwidth=10 reliefentries=4 polygonreliefangle="90 Angle" airgapwidth=10
PolygonConnect PolygonConnect_25hole [InNetClass('PwrGnd') And (AsMils(HoleDiameter) = 25)] p3: connectstyle=Direct reliefconductorwidth=10 reliefentries=4 polygonreliefangle="90 Angle" airgapwidth=10
PolygonConnect PolygonConnect_35hole [InNetClass('PwrGnd') And (AsMils(HoleDiameter) = 35)] p4: connectstyle=Direct reliefconductorwidth=10 reliefentries=4 polygonreliefangle="90 Angle" airgapwidth=10
PolygonConnect PolygonConnect_25hole_1 [InNetClass('PwrGnd') And (AsMils(HoleDiameter) = 42)] p5: connectstyle=Direct reliefconductorwidth=10 reliefentries=4 polygonreliefangle="90 Angle" airgapwidth=10
PolygonConnect PolygonConnect_skewers [IsPad And (AsMils(HoleDiameter) = 84)] p6: connectstyle=Relief reliefconductorwidth=20 reliefentries=4 polygonreliefangle="90 Angle" airgapwidth=10
PolygonConnect [All] p7: connectstyle=Relief reliefconductorwidth=9 reliefentries=4 polygonreliefangle="45 Angle" airgapwidth=10
RoutingTopology [All] p1: topology=Daisy_Simple
RoutingVias [All] p1: holewidth=10 width=20 viastyle="Through Hole" minholewidth=8 minwidth=20 maxholewidth=18 maxwidth=30
SMDNeckDown SMDNeckDown_wirebond_ [HasFootprint('Timepix4_WB_bands')] p1: percent=350.000
SMDNeckDown SMDNeckDown_U1_pwr [(IsPad And InComponent('U1'))] p2: percent=350.000
SMDNeckDown [(InComponent('U1') = 'False')] p3: percent=75.000
SilkToSilkClearance [All] p1 off: silktosilkclearance=10
SilkToSolderMaskClearance [IsPad] p1 off: minsilkscreentomaskgap=10 clearancetoexposedcopper=TRUE
SolderMaskExpansion SolderMaskExpansion_Via [IsVia] p1: expansion=3 istentingtop=FALSE
SolderMaskExpansion [All] p2: expansion=2 istentingtop=FALSE
UnRoutedNet [All] p1: checkbadconnections=TRUE
Width "Pwr and Gnd" [InNetClass('PwrGnd')] p1: maxlimit=80 minlimit=5 preferedwidth=20 midlayer2_minwidth=10 midlayer3_minwidth=10 midlayer4_minwidth=10 midlayer6_minwidth=10 bottomlayer_minwidth=6 minimp=50.000000 maximp=50.000000 favimp=50.000000
Width [All] p2: maxlimit=75 minlimit=5 preferedwidth=8 minimp=50.000000 maximp=50.000000 favimp=50.000000
19 further rules are at their usual default settings.

## Classes and differential pairs
net class PwrGnd: 3P3V 12P0V FMC_3P3V FMC_3P3Vaux GND VADJ VCC_33_U2 VDD VDD2V5 VDD_RAW VDD_U3 VDDA VDDA_RAW VDDA_U4 VDDGWT VDDGWT_RAW VDDGWT_U6 VDDPLL VDDPLL_RAW VDDPLL_U5 Vin_1p4_analog Vin_1p4_dig Vin_1p4_U3 Vin_1p4_U4 Vin_1p4_U5 Vin_1p4_U6 Vin_3p3_raw
component class Single_ETU_sht3: J1 TP18 TP19 TP27
component class Single_ETU_sht1_levelshift: C67 C68 C69 C70 C71 C72 C73 C74 C75 C76 C92 C96 C112 C115 C127 C135 C141 C142 C143 C144 C145 C146 C147 C148 C149 C150 C151 C152 C153 C154 C155 C156 C157 C158 C163 C164 C165 C166 C167 C168 C169 C170 C171 C172 C173 C174 C177 HV1 L1 R1 R2 R4 R5 R6 R7 R8 R9 R10 R11 R15 R16 R17 R18 R19 R20 R21 R22 R36 R37 R38 R39 TP1 TP2 TP3 TP4 TP5 TP6 U1 U2 U7 U8 U14
component class Single_ETU_sht4: \05 C1 C2 C3 C4 C5 C6 C7 C8 C9 C10 C11 C12 C13 C14 C15 C16 C17 C18 C19 C20 C21 C22 C23 C24 C25 C26 C27 C28 C29 C30 C31 C32 C33 C34 C35 C36 C37 C38 c39 C40 C41 C42 C43 C44 C45 C46 C47 C48 C49 C50 C51 C52 C53 C54 C55 C56 C57 C58 C59 C60 C61 C62 C63 C64 C65 C66 C77 C78 C79 C80 C81 C82 C83 C84 C85 C86 C87 C88 C89 C90 C91 C93 C94 C95 C97 C98 C99 C100 C101 C102 C103 C104 C105 C106 C107 C108 C109 C110 C111 C113 C114 C116 C117 C118 C119 C120 C121 C122 C123 C124 C125 C126 C128 C129 C130 C131 C132 C133 C134 C136 C137 C138 C139 C140 C159 C160 C161 C162 C175 C176 D1 D2 J2 J3 JMP1 JMP2 JMP3 JMP4 JMP5 JMP6 JMP7 JMP8 JMP9 JMP10 L2 L3 L4 L5 L6 L7 L8 L9 L10 R3 R12 R13 R14 R23 R24 R25 R26 R27 R28 R29 R30 R31 R32 R33 R34 R35 TP7 TP8 TP9 TP10 TP12 TP13 TP15 TP16 TP20 TP21 TP22 TP23 TP26 TP28 TP29 TP30 TP31 U3 U4 U5 U6 U9 U10 U11 U12 U13
differential pair GTP: +GTP_P -GTP_N
differential pair HTP: +HTP_P -HTP_N
differential pair S3T: +S3T_P -S3T_N
differential pair S2B: +S2B_P -S2B_N
differential pair S5B: +S5B_P -S5B_N
differential pair S6B: +S6B_P -S6B_N
differential pair S1B: +S1B_P -S1B_N
differential pair S6T: +S6T_P -S6T_N
differential pair S1T: +S1T_P -S1T_N
differential pair S0T: +S0T_P -S0T_N
differential pair S3B: +S3B_P -S3B_N
differential pair CLK_REF_T: +CLK_REF_T_P -CLK_REF_T_N
differential pair S7T: +S7T_P -S7T_N
differential pair S7B: +S7B_P -S7B_N
differential pair S5T: +S5T_P -S5T_N
differential pair S4T: +S4T_P -S4T_N
differential pair S4B: +S4B_P -S4B_N
differential pair S2T: +S2T_P -S2T_N
differential pair S0B: +S0B_P -S0B_N
differential pair T: +T_P -T_N
differential pair TPX4_RefClk: +TPX4_RefClk_P -TPX4_RefClk_N
differential pair TO_SYNC_T: +TO_SYNC_T_P -TO_SYNC_T_N
differential pair TO_SYNC_B: +TO_SYNC_B_P -TO_SYNC_B_N
differential pair TESTOUT_T: +TESTOUT_T_P -TESTOUT_T_N
differential pair TESTOUT_B: +TESTOUT_B_P -TESTOUT_B_N
differential pair SHUTTER_T: +SHUTTER_T_P -SHUTTER_T_N
differential pair SHUTTER_B: +SHUTTER_B_P -SHUTTER_B_N
differential pair SERIAL_OUT7_T: +SERIAL_OUT7_T_P -SERIAL_OUT7_T_N
differential pair SERIAL_OUT7_B: +SERIAL_OUT7_B_P -SERIAL_OUT7_B_N
differential pair SERIAL_OUT6_T: +SERIAL_OUT6_T_P -SERIAL_OUT6_T_N
differential pair SERIAL_OUT6_B: +SERIAL_OUT6_B_P -SERIAL_OUT6_B_N
differential pair SERIAL_OUT5_T: +SERIAL_OUT5_T_P -SERIAL_OUT5_T_N
differential pair SERIAL_OUT5_B: +SERIAL_OUT5_B_P -SERIAL_OUT5_B_N
differential pair SERIAL_OUT4_T: +SERIAL_OUT4_T_P -SERIAL_OUT4_T_N
differential pair SERIAL_OUT4_B: +SERIAL_OUT4_B_P -SERIAL_OUT4_B_N
differential pair SERIAL_OUT3_T: +SERIAL_OUT3_T_P -SERIAL_OUT3_T_N
differential pair SERIAL_OUT3_B: +SERIAL_OUT3_B_P -SERIAL_OUT3_B_N
differential pair SERIAL_OUT2_T: +SERIAL_OUT2_T_P -SERIAL_OUT2_T_N
differential pair SERIAL_OUT2_B: +SERIAL_OUT2_B_P -SERIAL_OUT2_B_N
differential pair SERIAL_OUT1_T: +SERIAL_OUT1_T_P -SERIAL_OUT1_T_N
differential pair SERIAL_OUT1_B: +SERIAL_OUT1_B_P -SERIAL_OUT1_B_N
differential pair SERIAL_OUT0_T: +SERIAL_OUT0_T_P -SERIAL_OUT0_T_N
differential pair SERIAL_OUT0_B: +SERIAL_OUT0_B_P -SERIAL_OUT0_B_N
differential pair SC_DATA_OUT_T: +SC_DATA_OUT_T_P -SC_DATA_OUT_T_N
differential pair SC_DATA_OUT_B: +SC_DATA_OUT_B_P -SC_DATA_OUT_B_N
differential pair SC_DATA_IN_T: +SC_DATA_IN_T_P -SC_DATA_IN_T_N
differential pair SC_DATA_IN_B: +SC_DATA_IN_B_P -SC_DATA_IN_B_N
differential pair SC_CLOCK_OUT_T: +SC_CLOCK_OUT_T_P -SC_CLOCK_OUT_T_N
differential pair SC_CLOCK_OUT_B: +SC_CLOCK_OUT_B_P -SC_CLOCK_OUT_B_N
differential pair SC_CLOCK_IN_T: +SC_CLOCK_IN_T_P -SC_CLOCK_IN_T_N
differential pair SC_CLOCK_IN_B: +SC_CLOCK_IN_B_P -SC_CLOCK_IN_B_N
differential pair RESET_T: +RESET_T_P -RESET_T_N
differential pair RESET_B: +RESET_B_P -RESET_B_N
differential pair IN: +IN_P -IN_N
differential pair CLK_REF_B: +CLK_REF_B_P -CLK_REF_B_N
differential pair B: +B_P -B_N

## Components (designator, comment, footprint, x,y, rotation, side; value= is the part's Value field where it differs from the comment)
C1 ".1uF" CAP_0201 962,490 r180 bottom
C2 ".1uF" CAP_0201 1022,476 r90 bottom
C3 ".1uF" CAP_0201 1077,390 r270 bottom locked
C4 ".1uF" CAP_0201 1095,490 r180 bottom
C5 ".1uF" CAP_0201 1127,462 r180 bottom
C6 ".1uF" CAP_0201 1230,390 r270 bottom locked
C7 ".1uF" CAP_0201 1175,490 r180 bottom
C8 ".1uF" CAP_0201 1235,475 r90 bottom locked
C9 ".1uF" CAP_0201 1277,390 r270 bottom locked
C10 ".1uF" CAP_0201 1289,490 r180 bottom
C11 ".1uF" CAP_0201 1372,415 r270 bottom locked
C12 ".1uF" CAP_0201 1359,461 r180 bottom
C13 ".1uF" CAP_0201 1424,415 r270 bottom locked
C14 ".1uF" CAP_0201 1391,490 r180 bottom locked
C15 ".1uF" CAP_0201 1475,415 r270 bottom locked
C16 ".1uF" CAP_0201 1458,461 r180 bottom
C17 ".1uF" CAP_0201 1527,415 r270 bottom locked
C18 ".1uF" CAP_0201 1497,490 r180 bottom locked
C19 ".1uF" CAP_0201 1591,415 r270 bottom locked
C20 ".1uF" CAP_0201 1576,461 r180 bottom
C21 ".1uF" CAP_0201 1644,415 r270 bottom locked
C22 ".1uF" CAP_0201 1611,490 r180 bottom locked
C23 ".1uF" CAP_0201 1695,415 r270 bottom locked
C24 ".1uF" CAP_0201 1689,461.46 r180 bottom
C25 ".1uF" CAP_0201 1748,415 r270 bottom locked
C26 ".1uF" CAP_0201 1717,490 r180 bottom locked
C27 ".1uF" CAP_0201 1785,475 r90 bottom locked
C28 ".1uF" CAP_0201 1864,380 r270 bottom locked
C29 ".1uF" CAP_0201 1906,417 r0 bottom locked
C30 ".1uF" CAP_0201 1836,490 r180 bottom
C31 ".1uF" CAP_0201 1901,475 r90 bottom
C32 ".1uF" CAP_0201 1990,457 r90 bottom
C33 ".1uF" CAP_0201 1946,489 r180 bottom
C34 ".1uF" CAP_0201 971,1720 r180 bottom locked
C35 ".1uF" CAP_0201 1063,1734 r270 bottom
C36 ".1uF" CAP_0201 1082,1820 r90 bottom locked
C37 ".1uF" CAP_0201 1114,1745 r180 bottom
C38 ".1uF" CAP_0201 1183,1735 r270 bottom
C39 ".1uF" CAP_0201 1225,1820 r90 bottom locked
C40 ".1uF" CAP_0201 1223,1759 r90 bottom
C41 ".1uF" CAP_0201 1274,1735 r270 bottom
C42 ".1uF" CAP_0201 1277,1820 r90 bottom locked
C43 ".1uF" CAP_0201 1311,1757 r90 bottom
C44 ".1uF" CAP_0201 1372,1795 r90 bottom locked
C45 ".1uF" CAP_0201 1360,1749 r180 bottom
C46 ".1uF" CAP_0201 1424,1795 r90 bottom locked
C47 ".1uF" CAP_0201 1398,1720 r180 bottom
C48 ".1uF" CAP_0201 1475,1795 r90 bottom locked
C49 ".1uF" CAP_0201 1469,1749 r180 bottom
C50 ".1uF" CAP_0201 1527,1795 r90 bottom locked
C51 ".1uF" CAP_0201 1498,1720 r180 bottom
C52 ".1uF" CAP_0201 1591,1795 r90 bottom locked
C53 ".1uF" CAP_0201 1575.84,1748.69 r180 bottom
C54 ".1uF" CAP_0201 1644,1795 r90 bottom locked
C55 ".1uF" CAP_0201 1611,1720 r180 bottom locked
C56 ".1uF" CAP_0201 1695,1795 r90 bottom locked
C57 ".1uF" CAP_0201 1683,1749 r180 bottom
C58 ".1uF" CAP_0201 1748,1795 r90 bottom locked
C59 ".1uF" CAP_0201 1717,1720 r180 bottom locked
C60 ".1uF" CAP_0201 1785,1735 r270 bottom locked
C61 ".1uF" CAP_0201 1891,1825 r0 bottom locked
C62 ".1uF" CAP_0201 1910,1793 r180 bottom
C63 ".1uF" CAP_0201 1843,1720 r180 bottom
C64 ".1uF" CAP_0201 1919,1735 r270 bottom
C65 ".1uF" CAP_0201 1981,1787 r0 bottom locked
C66 ".1uF" CAP_0201 1982,1721 r180 bottom
C67 "22uF" C0805 3275,1230 r180 top locked
C68 ".1uF" CAP_0201 3255,1175 r180 top locked
C69 ".1uF" CAP_0201 3240,980 r0 top
C70 ".1uF" CAP_0201 3100,1115 r180 top locked
C71 ".1uF" CAP_0201 3100,1090 r180 top locked
C72 ".1uF" CAP_0201 3390,1088 r180 top locked
C73 ".1uF" CAP_0201 3390,1063 r180 top locked
C74 ".1uF" CAP_0201 3100,1062 r180 top locked
C75 ".1uF" CAP_0201 3100,1037 r180 top locked
C76 ".1uF" CAP_0201 3350,1020 r270 top
C77 "47uF" C1210_M 2600,970 r0 bottom
C78 "22uF" C0805 880,1765 r90 bottom locked
C79 "22uF" C0805 2105,1745 r0 bottom locked
C80 "10uF" C0805 4330,1845 r270 top locked
C81 "47uF" C1210_M 4215,2075 r0 top locked
C82 "10uF" C0805 4095,1860 r0 top locked
C83 "22uF" C0805 3195,2060 r180 top
C84 "47uF" C1210_M 3125,1908.98 r90 top locked
C85 "22uF" C0805 3015,1895 r90 top locked
C86 "22uF" C0805 1000,1800 r180 bottom locked
C87 "22uF" C0805 2105,1820 r0 bottom locked
C88 ".1uF" CAP_0201 3885,1985 r270 top locked
C89 "10uF" C0805 3850,2073 r90 top locked
C90 "47uF" C1210_M 3750,2113 r90 top locked
C91 "0.01uF" 1608[0603] 3780,1890 r270 top locked
C92 ".1uF" CAP_0201 1505,325 r270 bottom
C93 "10uF" C0805 3350,1765 r270 top locked
C94 "10uF" C0805 3925,1740 r180 top locked
C95 ".1uF" CAP_0201 4000,1835 r270 top locked
C96 ".1uF" CAP_0201 1540,325 r270 bottom
C97 "22uF" C0805 1155,1830 r90 bottom locked
C98 "22uF" C0805 1405,1865 r180 bottom
C99 "10uF" C0805 4330,100 r270 top locked
C100 "47uF" C1210_M 4215,410 r0 top locked
C101 "10uF" C0805 4095,195 r0 top locked
C102 "22uF" C0805 3350,455 r90 top locked
C103 "47uF" C1210_M 3195,530 r0 top locked
C104 "22uF" C0805 3015,345 r270 top locked
C105 "22uF" C0805 1950,1880 r180 bottom locked
C106 "22uF" C0805 2105,1895 r0 bottom locked
C107 ".1uF" CAP_0201 3885,320 r270 top locked
C108 "10uF" C0805 3850,408 r90 top locked
C109 "47uF" C1210_M 3750,448 r90 top locked
C110 "10uF" C0805 3250,290 r180 top locked
C111 "0.01uF" 1608[0603] 3780,220 r270 top locked
C112 ".1uF" CAP_0201 5090,1995 r0 top
C113 "10uF" C0805 3925,75 r180 top locked
C114 ".1uF" CAP_0201 4000,170 r270 top locked
C115 ".1uF" CAP_0201 5090,1965 r0 top
C116 "22uF" C0805 3360,2130 r90 bottom
C117 "47uF" C1210_M 3250,2080 r90 bottom
C118 "22uF" C0805 3030,2110 r90 top
C119 "22uF" C0805 860,470 r180 bottom locked
C120 "22uF" C0805 2175,469 r0 bottom
C121 "22uF" C0805 880,395 r180 bottom locked
C122 "22uF" C0805 2165,400 r0 bottom locked
C123 "10uF" C0805 4305,535 r270 bottom locked
C124 "10uF" C0805 4205,675 r270 top locked
C125 "10uF" C0805 4080.47,705 r0 top locked
C126 "22uF" C0805 3350,825 r270 top locked
C127 ".1uF" CAP_0201 5040,1895 r0 top
C128 "22uF" C0805 3520,805 r90 top locked
C129 "10uF" C0805 4285,815 r0 top locked
C130 "22uF" C0805 1150,375 r270 bottom locked
C131 "10uF" C0805 4385,1125 r180 top locked
C132 "10uF" C0805 4205,1165 r270 top locked
C133 "10uF" C0805 4075,1195 r0 top locked
C134 "22uF" C0805 3410,1445 r0 top locked
C135 ".1uF" CAP_0201 5040,1865 r0 top
C136 "22uF" C0805 3475,1270 r180 top locked
C137 "22uF" C0805 1530,195 r0 bottom
C138 "10uF" C0805 4285,1305 r0 top locked
C139 "22uF" C0805 1910,265 r0 bottom locked
C140 "22uF" C0805 2025,395 r0 bottom locked
C141 ".1uF" CAP_0201 5090,1795 r0 top locked
C142 ".1uF" CAP_0201 5090,1765 r0 top locked
C143 ".1uF" CAP_0201 1660,1940 r0 bottom
C144 ".1uF" CAP_0201 1660,1905 r0 bottom
C145 ".1uF" CAP_0201 1750,2055 r0 bottom
C146 ".1uF" CAP_0201 1750,2025 r0 bottom
C147 ".1uF" CAP_0201 1885,1975 r0 bottom
C148 ".1uF" CAP_0201 1885,1940 r0 bottom
C149 ".1uF" CAP_0201 5235,898 r180 top
C150 ".1uF" CAP_0201 5235,863 r180 top
C151 ".1uF" CAP_0201 4915,1490 r0 top
C152 ".1uF" CAP_0201 4915,1460 r0 top
C153 ".1uF" CAP_0201 5232,1200 r180 top
C154 ".1uF" CAP_0201 5232,1165 r180 top
C155 ".1uF" CAP_0201 1726,325 r270 bottom locked
C156 ".1uF" CAP_0201 1761,325 r270 bottom locked
C157 ".1uF" CAP_0201 695,1815 r270 bottom locked
C158 ".1uF" CAP_0201 2555,500 r180 bottom locked
C159 ".1uF" CAP_0201 3840,90 r270 bottom locked
C160 ".1uF" CAP_0201 3830,1760 r270 bottom locked
C161 ".1uF" CAP_0201 2028,1760 r90 bottom
C162 ".1uF" CAP_0201 2035,469 r270 bottom
C163 ".1uF" CAP_0201 2820,1240 r90 top
C164 ".1uF" CAP_0201 2820,880 r270 top
C165 ".1uF" CAP_0201 4965,990 r0 top
C166 ".1uF" CAP_0201 4965,1020 r0 top
C167 ".1uF" CAP_0201 4970,1290 r0 top
C168 ".1uF" CAP_0201 4970,1320 r0 top
C169 ".1uF" CAP_0201 4995,1160 r0 top
C170 ".1uF" CAP_0201 4995,1130 r0 top
C171 ".1uF" CAP_0201 4945,915 r0 top
C172 ".1uF" CAP_0201 4945,945 r0 top
C173 ".1uF" CAP_0201 4975,1685 r0 top
C174 ".1uF" CAP_0201 4975,1715 r0 top
C175 ".1uF" CAP_0201 3870,1100 r90 bottom
C176 ".1uF" CAP_0201 4036,420 r180 bottom
C177 "100pF" 1608[0603] 555,400 r90 bottom
C178 ".1uF" CAP_0201 690,335 r180 bottom
D1 "1A @ 0.58V SMT Schottky diode" DO-219AD 3940,2045 r180 top locked
D2 "1A @ 0.58V SMT Schottky diode" DO-219AD 3940,380 r180 top locked
HV1 "HV_bond_pad" HV_BOND_PAD 885,1105 r0 top
J1 "MC-HPC-10" ASP-134488-01 4991,1105 r90 bottom locked
J2 "Header 3X2" HDR2X3 4544,-150 r0 top locked
J3 "Header 2" HDR1X2 2550,1090 r0 top
JMP1 "Header 3" HDR1X3#1 4420,375 r0 top locked
JMP2 "0.050\" Header 2" HDR_1X2_SMT_050 4105,1740 r90 top locked
JMP3 "0.050: Header 2" HDR_1X2_SMT_050 4105,75 r90 top locked
JMP4 "Header 3X2" HDR_2x3 3590,1920 r90 top locked
JMP5 "Header 3X2" HDR_2x3 3590,255 r90 top locked
JMP6 "0.050\" Header 2" HDR_1X2_SMT_050 4130,890 r90 top locked
JMP7 "Header 2X2 SMT" HDR_2X2_SMT 3835,760 r90 top locked
JMP8 "0.050\" Header 2" HDR_1X2_SMT_050 4130,1380 r90 top locked
JMP9 "Header 2X2 SMT" HDR_2X2_SMT 3835,1260 r90 top locked
JMP10 "Header 3" HDR1X3#2 4590,2060 r90 top
L1 "Inductor" IND_1206 3445,1155 r180 top locked value="120 ohms @ 100MHz"
L2 "Inductor" IND_1206 4180,1950 r180 top locked value="120 ohms @ 100MHz"
L3 "Inductor" IND_1206 3250,1920 r270 top locked value="120 ohms @ 100MHz"
L4 "Inductor" IND_1206 4180,285 r180 top locked value="120 ohms @ 100MHz"
L5 "Inductor" IND_1206 3195,400 r180 top locked value="120 ohms @ 100MHz"
L6 "Inductor" IND_1206 3298,1930 r180 bottom value="120 ohms @ 100MHz"
L7 "Inductor" IND_1206 4295,700 r90 bottom locked value="120 ohms @ 100MHz"
L8 "Inductor" IND_1206 3435,805 r90 top locked value="120 ohms @ 100MHz"
L9 "Inductor" IND_1206 4365,1215 r180 top locked value="120 ohms @ 100MHz"
L10 "Inductor" IND_1206 3430,1360 r180 top locked value="120 ohms @ 100MHz"
R1 "1k 1%" 1608[0603] 1015,2025 r0 bottom locked
R2 "1k 1%" 1608[0603] 1015,2090 r0 bottom locked
R3 "4.7k" 1608[0603] 3765,1260 r180 bottom
R4 "10k" 1608[0603] 2985,1270 r0 top locked
R5 "10k" 1608[0603] 2885,1270 r180 top locked
R6 "10k" 1608[0603] 2885,875 r180 top locked
R7 "10k" 1608[0603] 2990,875 r0 top locked
R8 "2k" 1608[0603] 2985,1220 r180 top locked
R9 "2k" 1608[0603] 2885,1220 r0 top locked
R10 "2k" 1608[0603] 2885,925 r0 top locked
R11 "2k" 1608[0603] 2990,925 r180 top locked
R12 "4.7k" 1608[0603] 4080,1795 r270 bottom
R13 "4.7k" 1608[0603] 3980,840 r0 top
R14 "4.7k" 1608[0603] 3980,1335 r0 top locked
R15 "0 OHMS" 1608[0603] 890,1910 r0 bottom
R16 "0 OHMS" 1608[0603] 897.56,1985 r0 bottom
R17 "0 OHMS" 1608[0603] 880,225 r0 bottom
R18 "0 OHMS" 1608[0603] 775,285 r0 bottom
R19 "10k" 1608[0603] 2830,2000 r90 top locked
R20 "10k" 1608[0603] 2910,2000 r90 top locked
R21 "1k 1%" 1608[0603] 970,170 r0 bottom locked
R22 "1k 1%" 1608[0603] 970,115 r0 bottom locked
R23 "12.4k" 1608[0603] 3735,1890 r90 top locked
R24 "24.9k" 1608[0603] 3685,1845 r90 top locked
R25 "12.4k" 1608[0603] 3735,220 r90 top locked
R26 "24.9k" 1608[0603] 3690,175 r90 top locked
R27 "8.2k" 1608[0603] 3980,795 r180 top locked
R28 "8.2k" 1608[0603] 3980,1290 r180 top locked
R29 "zero" 1608[0603] 4545,165 r180 top locked
R30 "4.7k" 1608[0603] 4445,2125 r270 bottom
R31 "4.7k" 1608[0603] 3730,950 r0 bottom
R32 "4.7k" 1608[0603] 3890,960 r0 bottom
R33 "4.7k" 1608[0603] 3980.59,624.41 r0 bottom
R34 "4.7k" 1608[0603] 4085,555 r270 bottom
R35 "10k" 1608[0603] 3759.51,1737.96 r0 top
R36 "10k" 1608[0603] 605,1630 r270 bottom
R37 "10k" 1608[0603] 495,535 r0 bottom
R38 "200k OHMS" 1608[0603] 495,400 r270 bottom
R39 "160k" 1608[0603] 270,560 r90 bottom
TP1 "surface mount TP" HV_solder_pad 100,1105 r0 top
TP2 "TP" TP#1 2810,240 r0 top
TP3 "TP" TP#2 175,815 r0 top
TP4 "Header 2" HDR1X2 2450,1240 r0 top
TP5 "TP" TP#3 2760,2110 r0 top locked
TP6 "TP" TP#1 2910,2120 r0 top locked
TP7 "TP" TP#1 175,1660 r0 top locked
TP8 "TP" TP#1 315,1810 r0 top locked
TP9 "TP" TP#1 3465,1735 r0 top
TP10 "TP" TP#1 315,1970 r90 top locked
TP12 "TP" TP#1 175,665 r90 top locked
TP13 "TP" TP#1 175,515 r180 top locked
TP15 "TP" TP#1 325,350 r90 top locked
TP16 "TP" TP#1 3985,1420 r90 top locked
TP18 "TP" TP#4 5270,400 r90 top locked
TP19 "TP" TP#4 5190,35 r90 top locked
TP20 "TP" TP#1 2670,1970 r90 top locked
TP21 "TP" TP#1 2730,1820 r0 top locked
TP22 "TP" TP#1 2670,240 r90 top
TP23 "TP" TP#1 2730,390 r90 top locked
TP26 "TP" TP#1 3615,1735 r90 top
TP27 "TP" TP#1 4560,1605 r90 top
TP28 "TP" TP#1 375,2120 r90 top locked
TP29 "TP" TP#1 2610,2120 r90 top locked
TP30 "TP" TP#1 325,200 r90 top locked
TP31 "TP" TP#1 2730,90 r0 top
U1 "Timepix4_WB" Timepix4_WB_bands 1496,1105 r0 top locked
U2 "NB6N11SMNG" QFN16_3x3_mm 3200,1105 r0 top locked
U3 "TPS7A8500RGRR" RGR0020A#1 3885,1860 r0 top locked value=Value
U4 "TPS7A8500RGRR" RGR0020A#2 3885,195 r0 top locked value=Value
U5 "ST1L08SPUR" DFN8_2X3_STM 4130,795 r180 top locked
U6 "ST1L08SPUR" DFN8_2X3_STM 4130,1290 r180 top locked
U7 "TMP102AIDRLR" DRL6 745,1795 r90 bottom locked
U8 "TMP102AIDRLR" DRL6 2471,480.31 r0 bottom locked
U9 "TMP102AIDRLR" DRL6 3765,115 r0 bottom locked
U10 "TMP102AIDRLR" DRL6 3765,1780 r0 bottom locked
U11 "NC7SZ08P5X" SC70-5_ONS-L 3780,1095 r0 bottom
U12 "BSS123" SOT23-3_ONS-M 4050,1925 r90 bottom
U13 "NC7SZ08P5X" SC70-5_ONS-L 3981.84,507.2 r0 bottom
U14 "PCA9306DCTRE4" DCT8 579,266 r180 bottom

## Footprints (in the part's own frame and the unit in brackets; to place one, negate y for a bottom-side part, rotate by r counter-clockwise, add the part's x,y. Pads: shape width x height; smd on the part's side, far side on the other; paste and mask are expansions set on the pad)
1608[0603] [mm]
  rect 0.8x0.9 smd: 1(-0.7,0) 2(0.7,0)
  body extent -0.87,-0.48 0.87,0.48, height 1.3
ASP-134488-01 [mil] "MC-HPC-10, 1.27mm PITCH TERMINAL ARRAY ASSEMBLY, MALE, VITA 57 CONNECTOR"
  round 25 smd paste+5 mask+2.01: A1(975,225) A2(925,225) A3(875,225) A4(825,225) A5(775,225) A6(725,225) A7(675,225) A8(625,225) A9(575,225) A10(525,225) A11(475,225) A12(425,225) A13(375,225) A14(325,225) A15(275,225) A16(225,225) A17(175,225) A18(125,225) A19(75,225) A20(25,225) A21(-25,225) A22(-75,225) A23(-125,225) A24(-175,225) A25(-225,225) A26(-275,225) A27(-325,225) A28(-375,225) A29(-425,225) A30(-475,225) A31(-525,225) A32(-575,225) A33(-625,225) A34(-675,225) A35(-725,225) A36(-775,225) A37(-825,225) A38(-875,225) A39(-925,225) A40(-975,225) B1(975,175) B2(925,175) B3(875,175) B4(825,175) B5(775,175) B6(725,175) B7(675,175) B8(625,175) B9(575,175) B10(525,175) B11(475,175) B12(425,175) B13(375,175) B14(325,175) B15(275,175) B16(225,175) B17(175,175) B18(125,175) B19(75,175) B20(25,175) B21(-25,175) B22(-75,175) B23(-125,175) B24(-175,175) B25(-225,175) B26(-275,175) B27(-325,175) B28(-375,175) B29(-425,175) B30(-475,175) B31(-525,175) B32(-575,175) B33(-625,175) B34(-675,175) B35(-725,175) B36(-775,175) B37(-825,175) B38(-875,175) B39(-925,175) B40(-975,175) E1(975,25) E2(925,25) E3(875,25) E4(825,25) E5(775,25) E6(725,25) E7(675,25) E8(625,25) E9(575,25) E10(525,25) E11(475,25) E12(425,25) E13(375,25) E14(325,25) E15(275,25) E16(225,25) E17(175,25) E18(125,25) E19(75,25) E20(25,25) E21(-25,25) E22(-75,25) E23(-125,25) E24(-175,25) E25(-225,25) E26(-275,25) E27(-325,25) E28(-375,25) E29(-425,25) E30(-475,25) E31(-525,25) E32(-575,25) E33(-625,25) E34(-675,25) E35(-725,25) E36(-775,25) E37(-825,25) E38(-875,25) E39(-925,25) E40(-975,25) F1(975,-25) F2(925,-25) F3(875,-25) F4(825,-25) F5(775,-25) F6(725,-25) F7(675,-25) F8(625,-25) F9(575,-25) F10(525,-25) F11(475,-25) F12(425,-25) F13(375,-25) F14(325,-25) F15(275,-25) F16(225,-25) F17(175,-25) F18(125,-25) F19(75,-25) F20(25,-25) F21(-25,-25) F22(-75,-25) F23(-125,-25) F24(-175,-25) F25(-225,-25) F26(-275,-25) F27(-325,-25) F28(-375,-25) F29(-425,-25) F30(-475,-25) F31(-525,-25) F32(-575,-25) F33(-625,-25) F34(-675,-25) F35(-725,-25) F36(-775,-25) F37(-825,-25) F38(-875,-25) F39(-925,-25) F40(-975,-25) J1(975,-175) J2(925,-175) J3(875,-175) J4(825,-175) J5(775,-175) J6(725,-175) J7(675,-175) J8(625,-175) J9(575,-175) J10(525,-175) J11(475,-175) J12(425,-175) J13(375,-175) J14(325,-175) J15(275,-175) J16(225,-175) J17(175,-175) J18(125,-175) J19(75,-175) J20(25,-175) J21(-25,-175) J22(-75,-175) J23(-125,-175) J24(-175,-175) J25(-225,-175) J26(-275,-175) J27(-325,-175) J28(-375,-175) J29(-425,-175) J30(-475,-175) J33(-625,-175) J34(-675,-175) J35(-725,-175) J36(-775,-175) J37(-825,-175) J38(-875,-175) J39(-925,-175) J40(-975,-175) K1(975,-225) K2(925,-225) K3(875,-225) K4(825,-225) K5(775,-225) K6(725,-225) K7(675,-225) K8(625,-225) K9(575,-225) K10(525,-225) K11(475,-225) K12(425,-225) K13(375,-225) K14(325,-225) K15(275,-225) K16(225,-225) K17(175,-225) K18(125,-225) K19(75,-225) K20(25,-225) K21(-25,-225) K22(-75,-225) K23(-125,-225) K24(-175,-225) K25(-225,-225) K26(-275,-225) K27(-325,-225) K28(-375,-225) K29(-425,-225) K30(-475,-225) K33(-625,-225) K34(-675,-225) K35(-725,-225) K36(-775,-225) K37(-825,-225) K38(-875,-225) K39(-925,-225) K40(-975,-225)
  round 25 smd paste+5 mask+2: C1(975,125) C2(925,125) C3(875,125) C4(825,125) C5(775,125) C6(725,125) C7(675,125) C8(625,125) C9(575,125) C10(525,125) C11(475,125) C12(425,125) C13(375,125) C14(325,125) C15(275,125) C16(225,125) C17(175,125) C18(125,125) C19(75,125) C20(25,125) C21(-25,125) C22(-75,125) C23(-125,125) C24(-175,125) C25(-225,125) C26(-275,125) C27(-325,125) C28(-375,125) C29(-425,125) C30(-475,125) C31(-525,125) C32(-575,125) C33(-625,125) C34(-675,125) C35(-725,125) C36(-775,125) C37(-825,125) C38(-875,125) C39(-925,125) C40(-975,125) D1(975,75) D2(925,75) D3(875,75) D4(825,75) D5(775,75) D6(725,75) D7(675,75) D8(625,75) D9(575,75) D10(525,75) D11(475,75) D12(425,75) D13(375,75) D14(325,75) D15(275,75) D16(225,75) D17(175,75) D18(125,75) D19(75,75) D20(25,75) D21(-25,75) D22(-75,75) D23(-125,75) D24(-175,75) D25(-225,75) D26(-275,75) D27(-325,75) D28(-375,75) D29(-425,75) D30(-475,75) D31(-525,75) D32(-575,75) D33(-625,75) D34(-675,75) D35(-725,75) D36(-775,75) D37(-825,75) D38(-875,75) D39(-925,75) D40(-975,75) G1(975,-75) G2(925,-75) G3(875,-75) G4(825,-75) G5(775,-75) G6(725,-75) G7(675,-75) G8(625,-75) G9(575,-75) G10(525,-75) G11(475,-75) G12(425,-75) G13(375,-75) G14(325,-75) G15(275,-75) G16(225,-75) G17(175,-75) G18(125,-75) G19(75,-75) G20(25,-75) G21(-25,-75) G22(-75,-75) G23(-125,-75) G24(-175,-75) G25(-225,-75) G26(-275,-75) G27(-325,-75) G28(-375,-75) G29(-425,-75) G30(-475,-75) G31(-525,-75) G32(-575,-75) G33(-625,-75) G34(-675,-75) G35(-725,-75) G36(-775,-75) G37(-825,-75) G38(-875,-75) G39(-925,-75) G40(-975,-75) H1(975,-125) H2(925,-125) H3(875,-125) H4(825,-125) H5(775,-125) H6(725,-125) H7(675,-125) H8(625,-125) H9(575,-125) H10(525,-125) H11(475,-125) H12(425,-125) H13(375,-125) H14(325,-125) H15(275,-125) H16(225,-125) H17(175,-125) H18(125,-125) H19(75,-125) H20(25,-125) H21(-25,-125) H22(-75,-125) H23(-125,-125) H24(-175,-125) H25(-225,-125) H26(-275,-125) H27(-325,-125) H28(-375,-125) H29(-425,-125) H30(-475,-125) H31(-525,-125) H32(-575,-125) H33(-625,-125) H34(-675,-125) H35(-725,-125) H36(-775,-125) H37(-825,-125) H38(-875,-125) H39(-925,-125) H40(-975,-125)
  oval 23x25 smd paste+5 mask+2.01: J31(-525,-175) J32(-575,-175) K31(-525,-225) K32(-575,-225)
  round 2 hole 50 unplated: MH1(1070.5,0) MH2(-1070.5,-120)
  silkscreen extent -1110,-289 1133,289, body extent -1098,-289 1133,289, height 281
C0805 [mm] "Chip Capacitor, Body 2.0x1.3mm, IPC High Density"
  rect 1.1x1.4 smd: 1(-0.75,0) 2(0.75,0)
  body extent -1.1,-0.72 1.1,0.72, height 1.4
C1210_M [mm] "Chip Capacitor, Body 3.2x2.5mm, IPC Low Density"
  rect 1.5x2.8 smd: 1(-1.55,0) 2(1.55,0)
  silkscreen extent -0.4,-1.3 0.4,1.3, body extent -1.7,-1.35 1.7,1.35, height 1.5
CAP_0201 [mil]
  rect 18x18 smd: 1(-14,0) 2(14,0)
DCT8 [mil]
  rect 61.5x15.7 smd: 1(-74.8,38.4) 2(-74.8,12.8) 3(-74.8,-12.8) 4(-74.8,-38.4) 5(74.8,-38.4) 6(74.8,-12.8) 7(74.8,12.8) 8(74.8,38.4)
  silkscreen extent -57,-62 57,62, body extent 0,0 10,10, height 10
DFN8_2X3_STM [mil]
  rect 28x12 smd paste+0 mask+0: 1(-59,29.53) 2(-59,9.84) 3(-59,-9.84) 4(-59,-29.53) 5(59,-29.53) 6(59,-9.84) 7(59,9.84) 8(59,29.53)
  rect 75x69 smd paste-2 mask+0: 9(0,0)
  silkscreen extent -104,34 -92,46, body extent 0,0 10,10, height 10
DO-219AD [mil] "DO-219AD aka MicroSMP"
  rect 32x32 smd: 1(0,0)
  rect 79x32 smd: 2(-75,0)
  silkscreen extent -150,-30 30,30
DRL6 [mil]
  rect 27x12 smd: 1(-29,19.68) 2(-29,0) 3(-29,-19.69) 4(29,-19.69) 5(29,0) 6(29,19.68)
  silkscreen extent -76,44 -64,56, body extent 0,0 10,10, height 10
HDR1X2 [mil] "Connector; Header; 2 Position"
  rect 72x72 / inner round 72 / far side rect 72x72 hole 42: 1(0,0)
  round 72 hole 42: 2(100,0)
  silkscreen extent -50,-50 150,50
HDR1X3#1 [mil] "Connector; Header; 3 Position"
  rect 72x72 / inner round 72 / far side rect 72x72 hole 42: 1(0,0)
  round 72 hole 42: 2(100,0) 3(200,0)
  silkscreen extent -50,-50 250,50
HDR1X3#2 [mil] "Connector; Header; 3 Position"
  rect 59.06x59.06 hole 35.43: 1(0,0)
  round 59.06 hole 35.43: 2(100,0) 3(200,0)
  silkscreen extent -50,-50 250,50
HDR2X3 [mm] "Connector; Header; 3x2 Position"
  rect 1.5x1.5 / inner round 1.5 / far side rect 1.5x1.5 hole 0.889: 1(0,0)
  round 1.5 hole 0.889: 2(0,2.54) 3(2.54,0) 4(2.54,2.54) 5(5.08,0) 6(5.08,2.54)
  silkscreen extent -1.27,-1.27 6.35,3.81
HDR_1X2_SMT_050 [mil]
  rect 26x120 smd: 1(0,0) 2(50,-120)
  silkscreen extent -63,-192 76,72
HDR_2X2_SMT [mil]
  rect 40x126 smd: 1(0,0) 2(0,200) 3(100,0) 4(100,200)
  silkscreen extent -98,-103 150,275
HDR_2x3 [mil]
  rect 80x80 / inner round 80 / far side rect 80x80 hole 42: 1(0,0)
  round 80 hole 42: 2(0,100) 3(100,0) 4(100,100) 5(200,0) 6(200,100)
  silkscreen extent -75,-75 275,175
HV_BOND_PAD [mil] "Bonding site for high voltage bias to Timepix"
  oval 40x20 smd paste-30 mask+10: 1(0,0)
  silkscreen extent -118,-118 118,118
HV_solder_pad [mil] "wire soldering site for high voltage bias to Timepix"
  round 75 smd: 1(0,0)
  silkscreen extent -58,-157 157,157
IND_1206 [mil] "Chip Inductor, 2-Leads, Body 3.20x1.60mm, IPC Low Density"
  rect 70x80 smd: 1(-62,0) 2(62,0)
  silkscreen extent -105,-40 20,48, body extent -67,-35 67,35, height 110
QFN16_3x3_mm [mm]
  rect 0.58x0.3 smd: 1(0,0) 2(0,-0.5) 3(0,-1) 4(0,-1.5) 9(2.72,-1.5) 10(2.72,-1) 11(2.72,-0.5) 12(2.72,0)
  rect 0.3x0.58 smd: 5(0.61,-2.11) 6(1.1,-2.11) 7(1.61,-2.11) 8(2.1,-2.11) 13(2.1,0.61) 14(1.61,0.61) 15(1.1,0.61) 16(0.61,0.61)
  rect 1.789x1.789 smd paste-0.076: 17(1.36,-0.75)
  silkscreen extent -1.45,-2.75 3.38,1.27
RGR0020A#1 [mm]
  oval 0.6x0.24 smd paste+0 mask+0.051: 1(-1.65,1) 2(-1.65,0.5) 3(-1.65,0) 4(-1.65,-0.5) 5(-1.65,-1) 11(1.65,-1) 12(1.65,-0.5) 13(1.65,0) 14(1.65,0.5) 15(1.65,1)
  oval 0.24x0.6 smd paste+0 mask+0.051: 6(-1,-1.65) 7(-0.5,-1.65) 8(0,-1.65) 9(0.5,-1.65) 10(1,-1.65) 16(1,1.65) 17(0.5,1.65) 18(0,1.65) 19(-0.5,1.65) 20(-1,1.65)
  rect 2.05x2.05 smd paste-0.051 mask+0.051: 21(0,0)
  round 0.5 hole 0.203 mask+0.051: V(-0.775,0) V(0,-0.775) V(0,0.775) V(0.775,0)
  silkscreen extent -1.97,-1.98 1.98,1.98, body extent 0,0 0.25,0.25, height 0.25
RGR0020A#2 [mm]
  oval 0.6x0.24 smd paste+0 mask+0.051: 1(-1.65,1) 2(-1.65,0.5) 3(-1.65,0) 4(-1.65,-0.5) 5(-1.65,-1) 11(1.65,-1) 12(1.65,-0.5) 13(1.65,0) 14(1.65,0.5) 15(1.65,1)
  oval 0.24x0.6 smd paste+0 mask+0: 6(-1,-1.65)
  oval 0.24x0.6 smd paste+0 mask+0.051: 7(-0.5,-1.65) 8(0,-1.65) 9(0.5,-1.65) 10(1,-1.65) 16(1,1.65) 17(0.5,1.65) 18(0,1.65) 19(-0.5,1.65) 20(-1,1.65)
  rect 2.05x2.05 smd paste-0.051 mask+0.051: C(0,0)
  round 0.5 hole 0.203 mask+0.051: V(-0.775,0) V(0,-0.775) V(0,0.775) V(0.775,0)
  silkscreen extent -1.97,-1.98 1.98,1.98, body extent 0,0 0.25,0.25, height 0.25
SC70-5_ONS-L [mil]
  rect 24x16 smd paste+2 mask+2: 1(-38,25.5) 2(-38,0) 3(-38,-25.5) 4(38,-25.5) 5(38,25.5)
  silkscreen extent -77,-48 32,57, body extent 0,0 10,10, height 10
SOT23-3_ONS-M [mil]
  rect 32x67 smd paste+0 mask+0: D(0,40.5) G(-40,-40.5) S(40,-40.5)
  silkscreen extent -90,-77 65,33, body extent 0,0 10,10, height 10
Timepix4_WB_bands [mil] "Pixelated chip"
  rect 6x8 smd: 1(-480,-623) 2(-474,-623) 3(-461.82,-623) 4(-455.32,-623) 5(-448.78,-623) 6(-442.19,-623) 7(-441.15,-638) 8(-434.7,-638) 14(-389,-623) 25(-321,-638) 26(-314,-638) 39(-230,-638) 40(-223,-638) 44(-199,-623) 72(-10,-663) 80(43,-638) 141(432,-623) 142(439,-638) 148(-479.5,625) 149(-473.5,625) 150(-462,625) 151(-455.5,625) 152(-449.5,625) 153(-443.5,625) 154(-440,638) 155(-434,638) 161(-389,625) 166(-352,625) 167(-346,625) 172(-317,638) 173(-311,638) 186(-229,638) 187(-223,638) 191(-195,625) 203(-112,663) 211(-60,638) 237(105,663) 245(160,638) 261(263.5,638) 275(352,625) 278(380,638)
  rect 5x8 smd: 9(-433,-663) 10(-423,-663) 11(-413,-638) 12(-403,-638) 13(-393,-638) 15(-383,-638) 16(-373,-638) 17(-363,-638) 18(-353,-663) 19(-354,-623) 20(-349,-623) 21(-338,-623) 22(-333,-623) 23(-328,-623) 24(-323,-623) 27(-313,-663) 28(-303,-663) 29(-293,-663) 31(-275.5,-638) 32(-265,-638) 33(-263.5,-623) 34(-258.5,-623) 35(-248,-623) 36(-243,-623) 37(-238,-623) 38(-233,-623) 41(-223,-663) 42(-213,-663) 43(-206,-638) 45(-194,-638) 46(-183.5,-638) 47(-173,-638) 48(-162.5,-638) 49(-162,-623) 50(-157,-623) 51(-147,-623) 52(-142,-623) 53(-137,-623) 54(-131,-638) 55(-120.5,-638) 56(-112,-663) 57(-112,-623) 58(-107,-623) 59(-96,-623) 60(-91,-623) 61(-86,-623) 62(-80.5,-638) 63(-70,-638) 64(-59,-638) 65(-56,-623) 66(-51,-623) 67(-41,-623) 68(-36,-623) 69(-31,-623) 70(-29.5,-638) 71(-19,-638) 73(-9,-623) 74(-4,-623) 75(6,-623) 76(11,-623) 77(16,-623) 78(21.5,-638) 79(32,-638) 81(46,-623) 82(51,-623) 83(56,-623) 84(66,-623) 85(71,-623) 86(76,-623) 87(81,-623) 88(84,-638) 89(94.5,-638) 90(101.5,-663) 91(106.5,-623) 92(111.5,-623) 93(122,-623) 94(127,-623) 95(132,-623) 96(137,-638) 97(147.5,-638) 99(162,-623) 100(167,-623) 101(177,-623) 102(182,-623) 103(187,-623) 104(190,-638) 105(200.5,-638) 106(208,-663) 107(211,-623) 108(216,-623) 109(226,-623) 110(231,-623) 111(236,-623) 112(246.5,-638) 113(258,-638) 114(267.5,-655) 115(267,-623) 116(272,-623) 117(282,-623) 118(288,-623) 119(292,-638) 120(298,-638) 121(303,-623) 122(308,-623) 123(308,-663) 124(318,-663) 125(327.5,-638) 126(338,-638) 127(348.5,-638) 128(353,-623) 129(359.5,-638) 130(370,-638) 131(380,-638) 132(386,-655) 133(385,-623) 134(390,-623) 135(400,-623) 136(405,-623) 137(410,-623) 138(415,-623) 139(420,-638) 140(425,-638) 143(448,-623) 144(454,-623) 145(473.5,-623) 146(478.5,-623) 156(-433.5,663) 157(-423,663) 158(-413,638) 159(-403,638) 160(-393,638) 162(-383,638) 163(-373,638) 164(-363,638) 165(-353,638) 168(-335,625) 169(-330,625) 170(-325,625) 171(-320,625) 174(-309,663) 175(-299,663) 176(-289,663) 178(-276,638) 179(-266,638) 180(-262.5,625) 181(-257.5,625) 182(-247,625) 183(-242,625) 184(-237,625) 185(-232,625) 188(-221,663) 189(-211,663) 190(-201,638) 192(-191,638) 193(-181,638) 194(-171,638) 195(-161,638) 196(-160,625) 197(-155,625) 198(-145,625) 199(-140,625) 200(-135,625) 201(-129.5,638) 202(-119,638) 204(-108.5,625) 205(-103,625) 206(-93,625) 207(-88,625) 208(-83,625) 209(-81.5,638) 210(-71,638) 212(-53,625) 213(-48,625) 214(-37.5,625) 215(-32.5,625) 216(-27.5,625) 217(-24,638) 218(-13.5,638) 219(-7,663) 220(-6,625) 221(-1,625) 222(9.5,625) 223(14.5,625) 224(19.5,625) 225(28,638) 226(38.5,638) 227(49,638) 228(49.5,625) 229(54.5,625) 230(59.5,625) 231(71,625) 232(76,625) 233(81,625) 234(86,625) 235(87.5,638) 236(98,638) 238(108.5,625) 239(113.5,625) 240(123.5,625) 241(128.5,625) 242(133.5,625) 243(138,638) 244(148.5,638) 246(162.5,625) 247(167.5,625) 248(178,625) 249(183,625) 250(188,625) 251(189.5,638) 252(200,638) 253(211,663) 254(214.5,625) 255(219.5,625) 256(230,625) 257(235,625) 258(240,625) 259(242,638) 260(252.5,638) 262(270,625) 263(275,625) 264(285,625) 265(290,625) 266(294,638) 267(300,638) 268(304,625) 269(309,625) 270(308,663) 271(318,663) 272(328,638) 273(338,638) 274(348,638) 276(358.5,638) 277(369,638) 280(391,625) 281(396,625) 282(411.5,625) 283(406.5,625) 284(416.5,625) 285(421.5,625) 286(427,638) 287(432,638) 288(435.5,625) 290(452.5,625) 291(457.5,625) 292(468,625) 293(473,625)
  rect 12x12 smd: 30(-290,-640)
  rect 10x8 smd: 98(160,-638) 147(491,-638)
  rect 12x8 smd: 177(-290,638) 294(487,625)
  rect 12x16 smd: 279(394.5,642) 289(447,667)
  body extent -486,-590 486,590, height 50
TP#1 [mil]
  rect 80x80 / inner round 80 / far side rect 80x80 hole 42: 1(0,0)
  silkscreen extent -55,-55 55,55
TP#2 [mil]
  rect 80x80 hole 42: 1(0,0)
  silkscreen extent -55,-55 55,55
TP#3 [mil]
  rect 80x80 / inner round 80 / far side rect 80x80 hole 42: 1(0,10)
  silkscreen extent -55,-45 55,65
TP#4 [mil]
  round 72 hole 42: 1(0,0)
  silkscreen extent -55,-45 55,45